# Altium PCB TYPEC_4KRECEIVER-v1.0.PcbDoc (part 1 of 12)
Units mil, origin at the board's own origin, x right, y up, seen from the top; angles counter-clockwise.
Board outline 2834.7 x 1259.84 mil, 10 copper layers (Top Layer, GND-1, Signal L1, GND-2, PWR-1, PWR-2, GND-3, Signal L2, GND-4, Bottom Layer), stack 61.686 mil thick; 492 components, 339 nets, 2214 pads, 1169 vias.
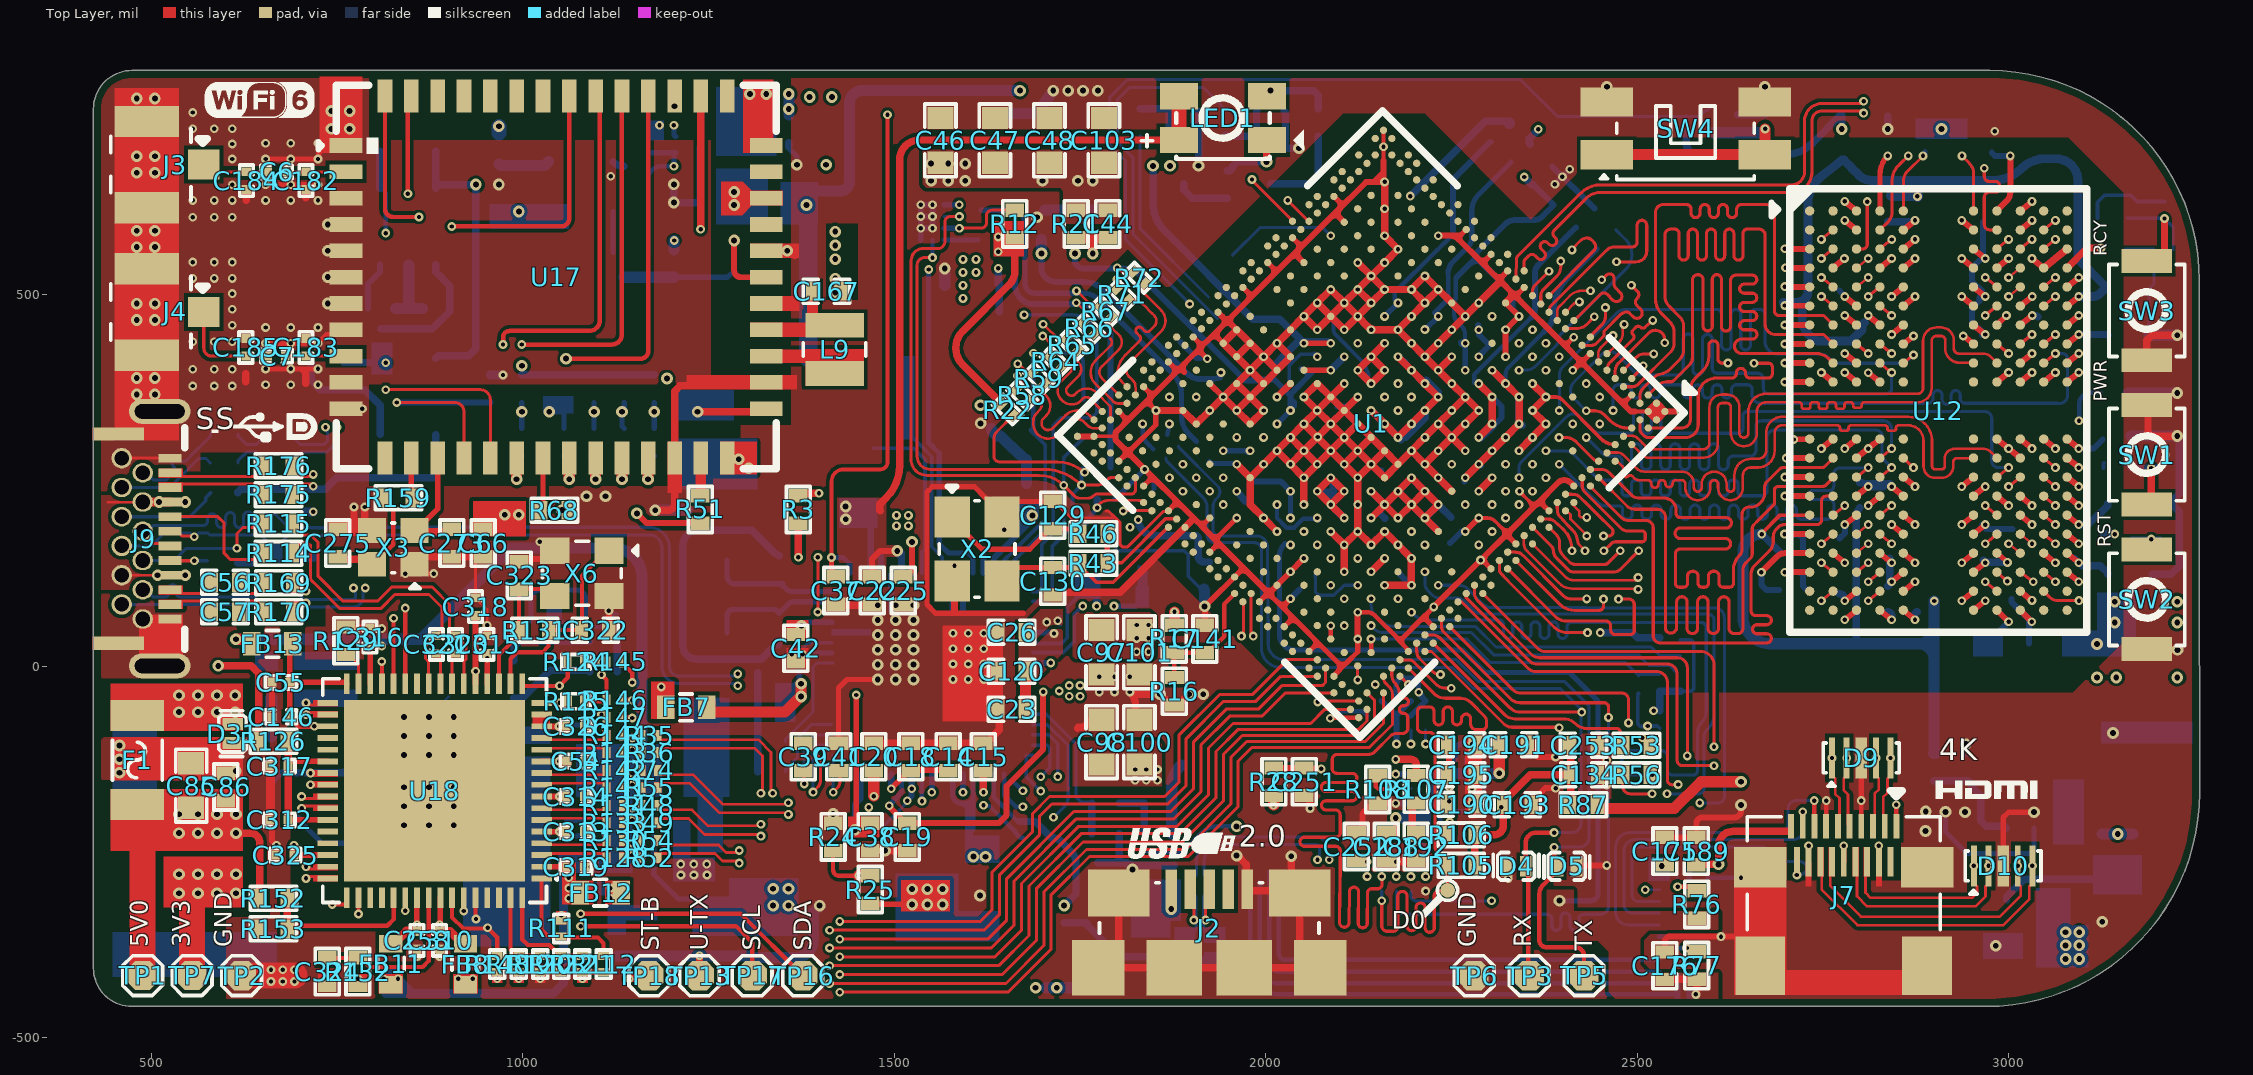
[diagram p0: Top Layer view]
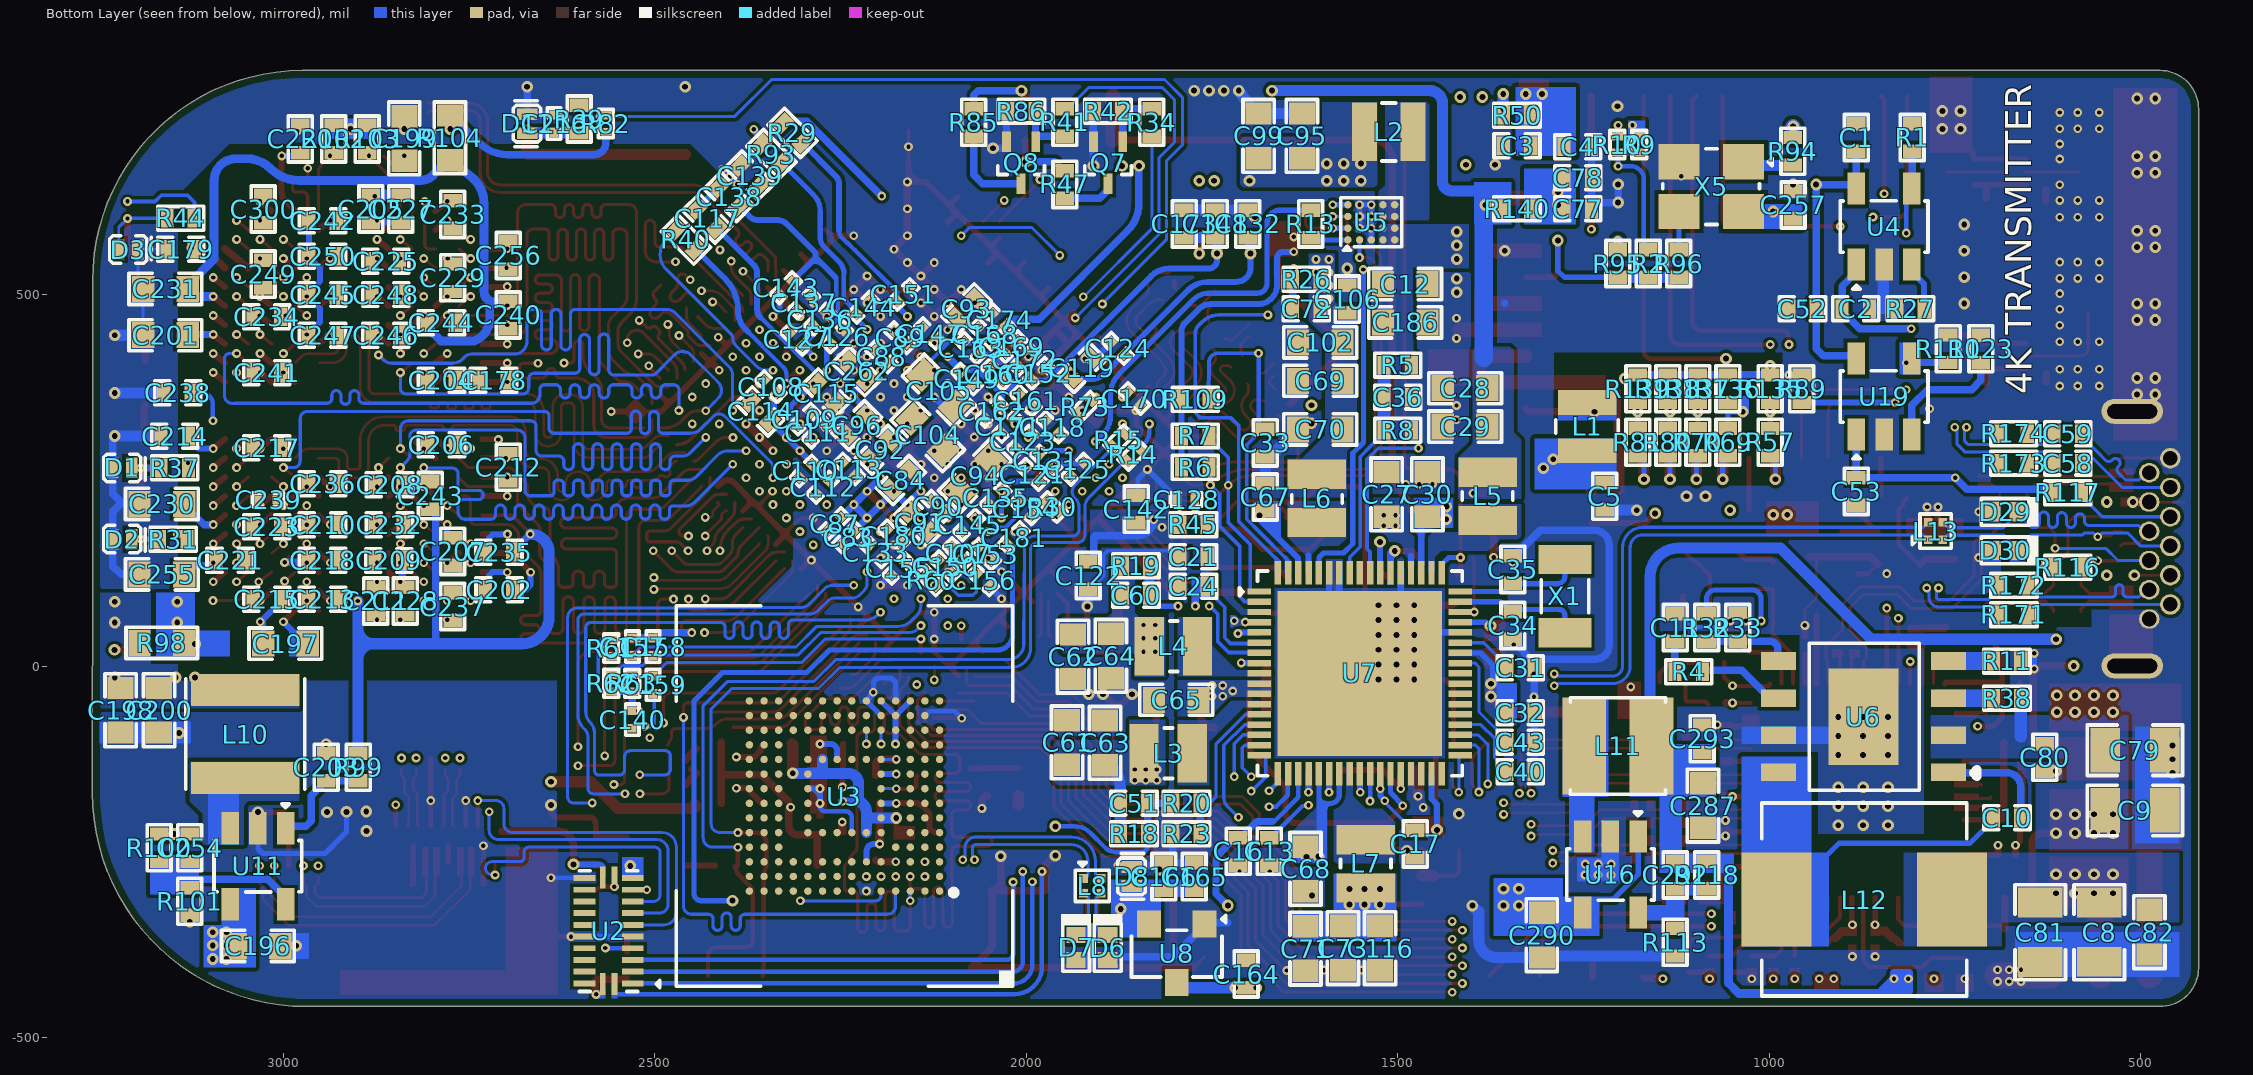
[diagram p1: Bottom Layer view, seen from below]
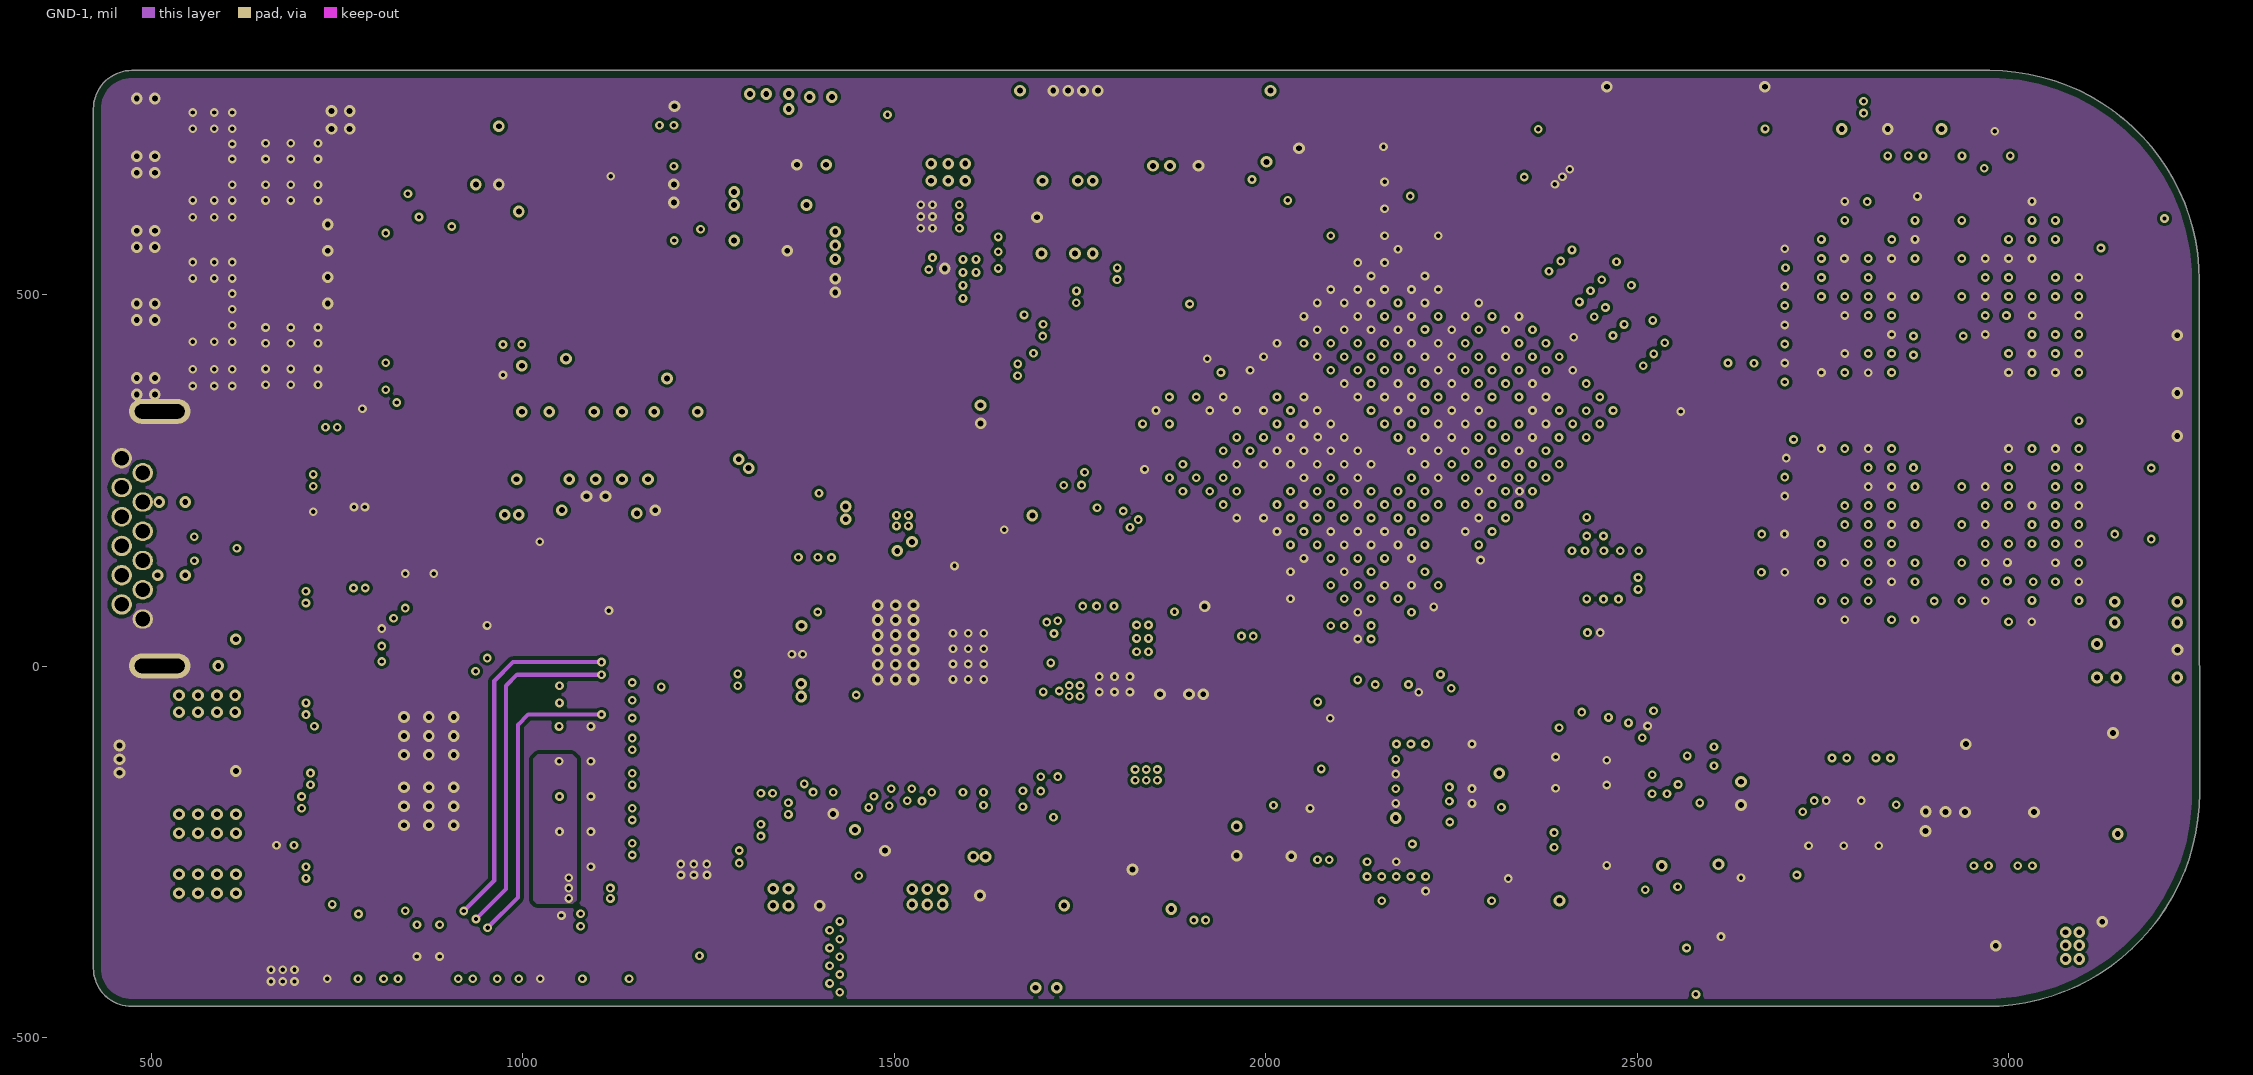
[diagram p2: GND-1]
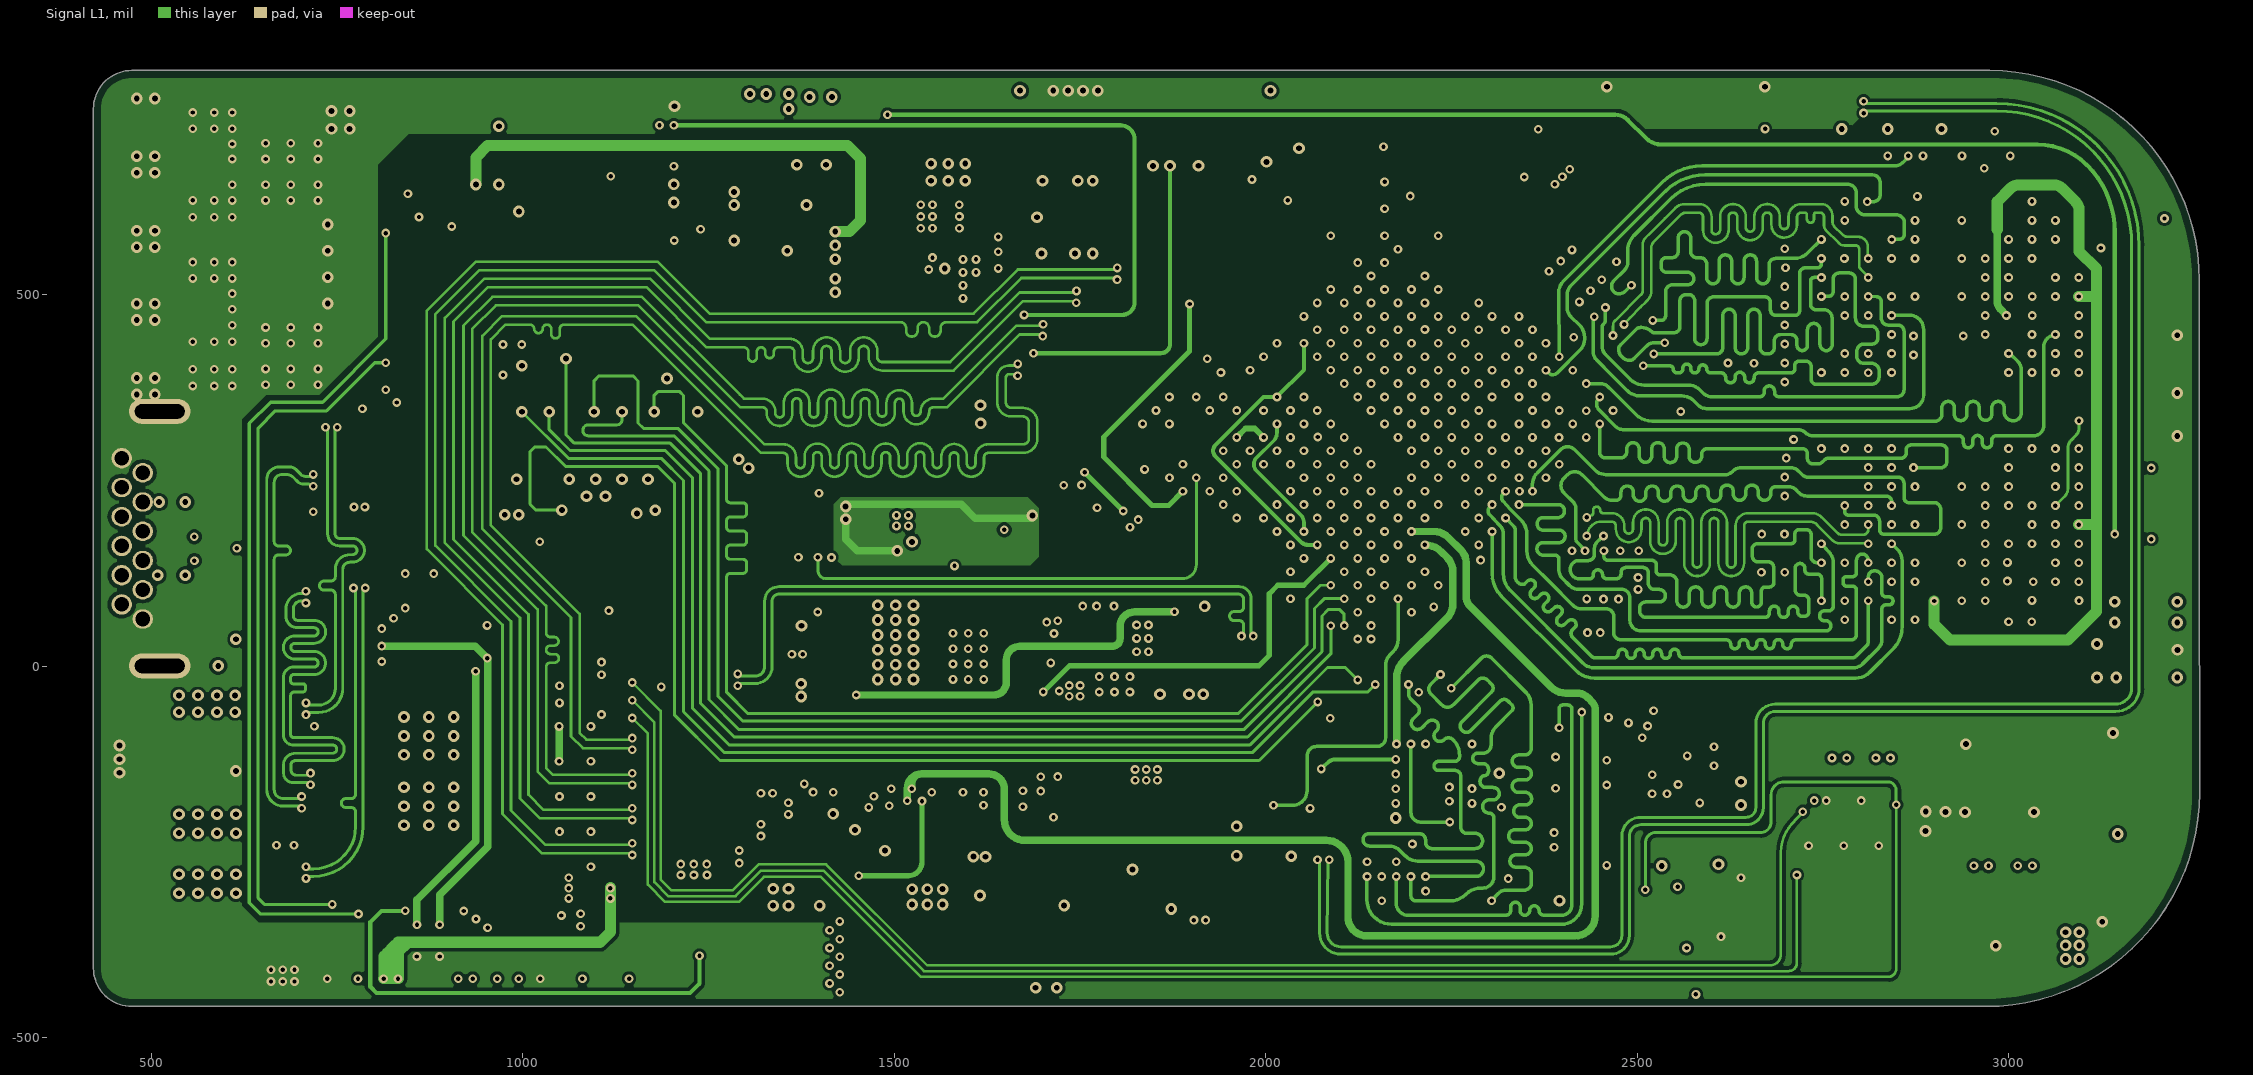
[diagram p3: Signal L1]
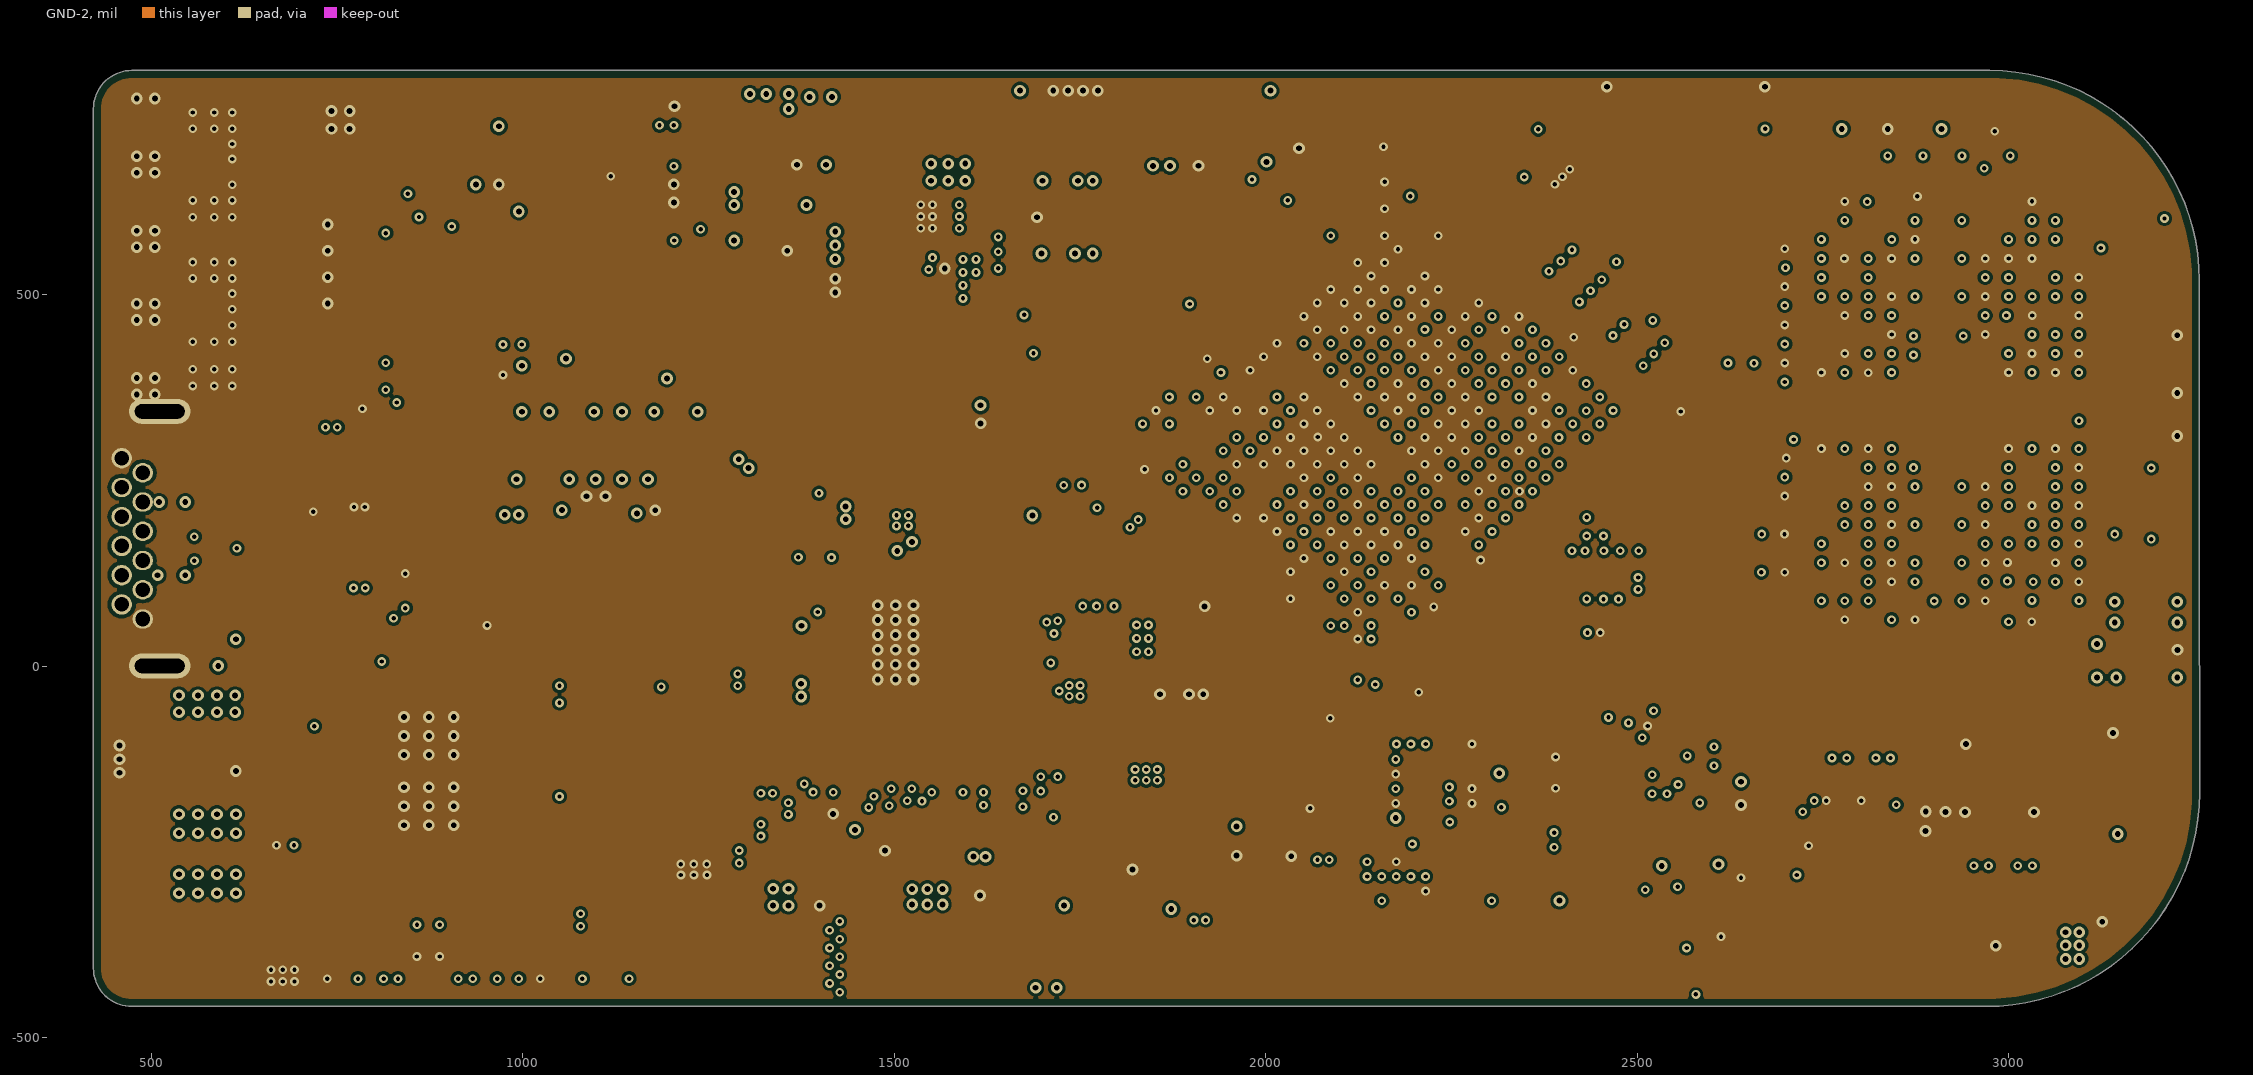
[diagram p4: GND-2]
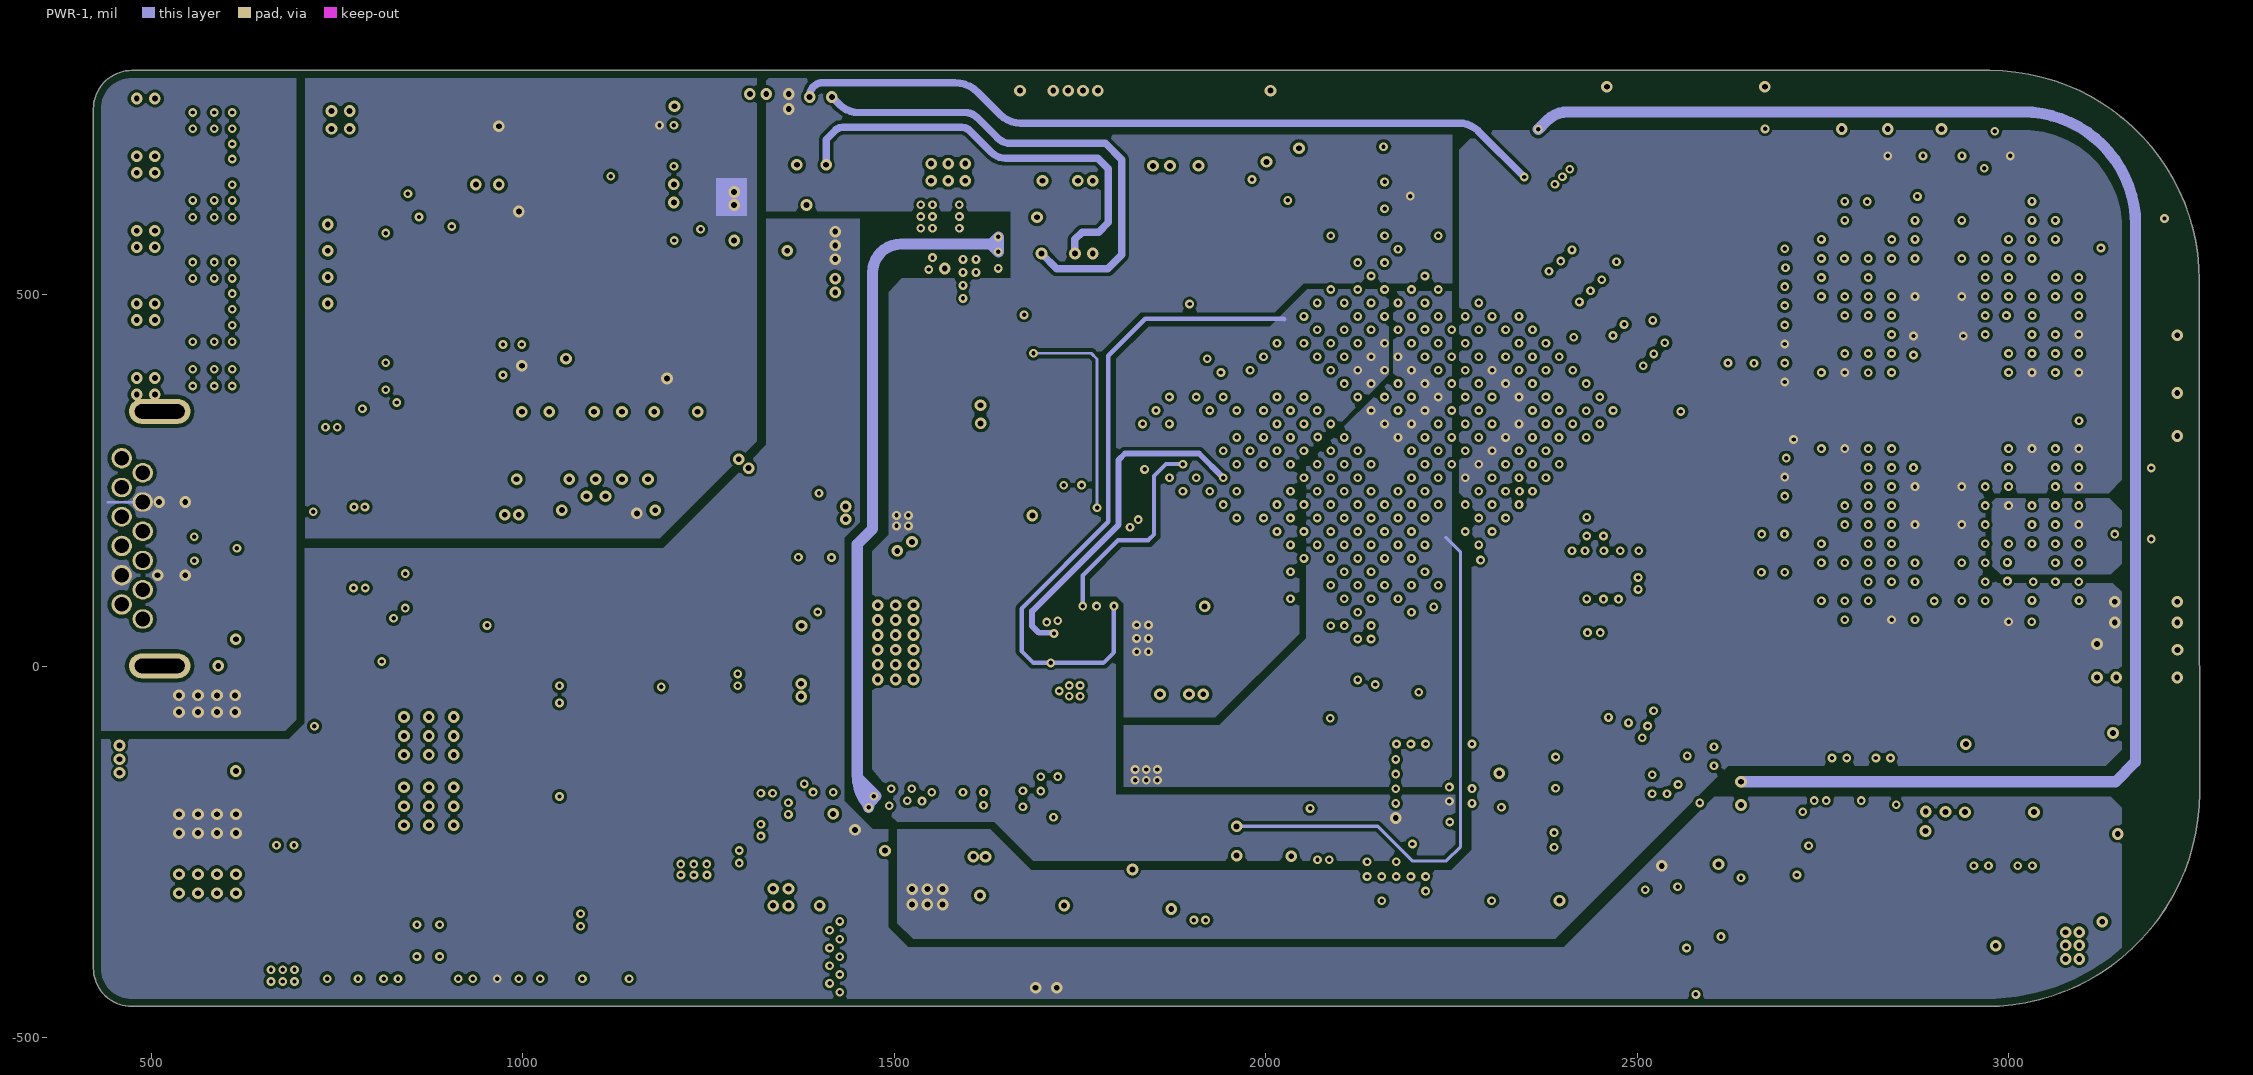
[diagram p5: PWR-1]
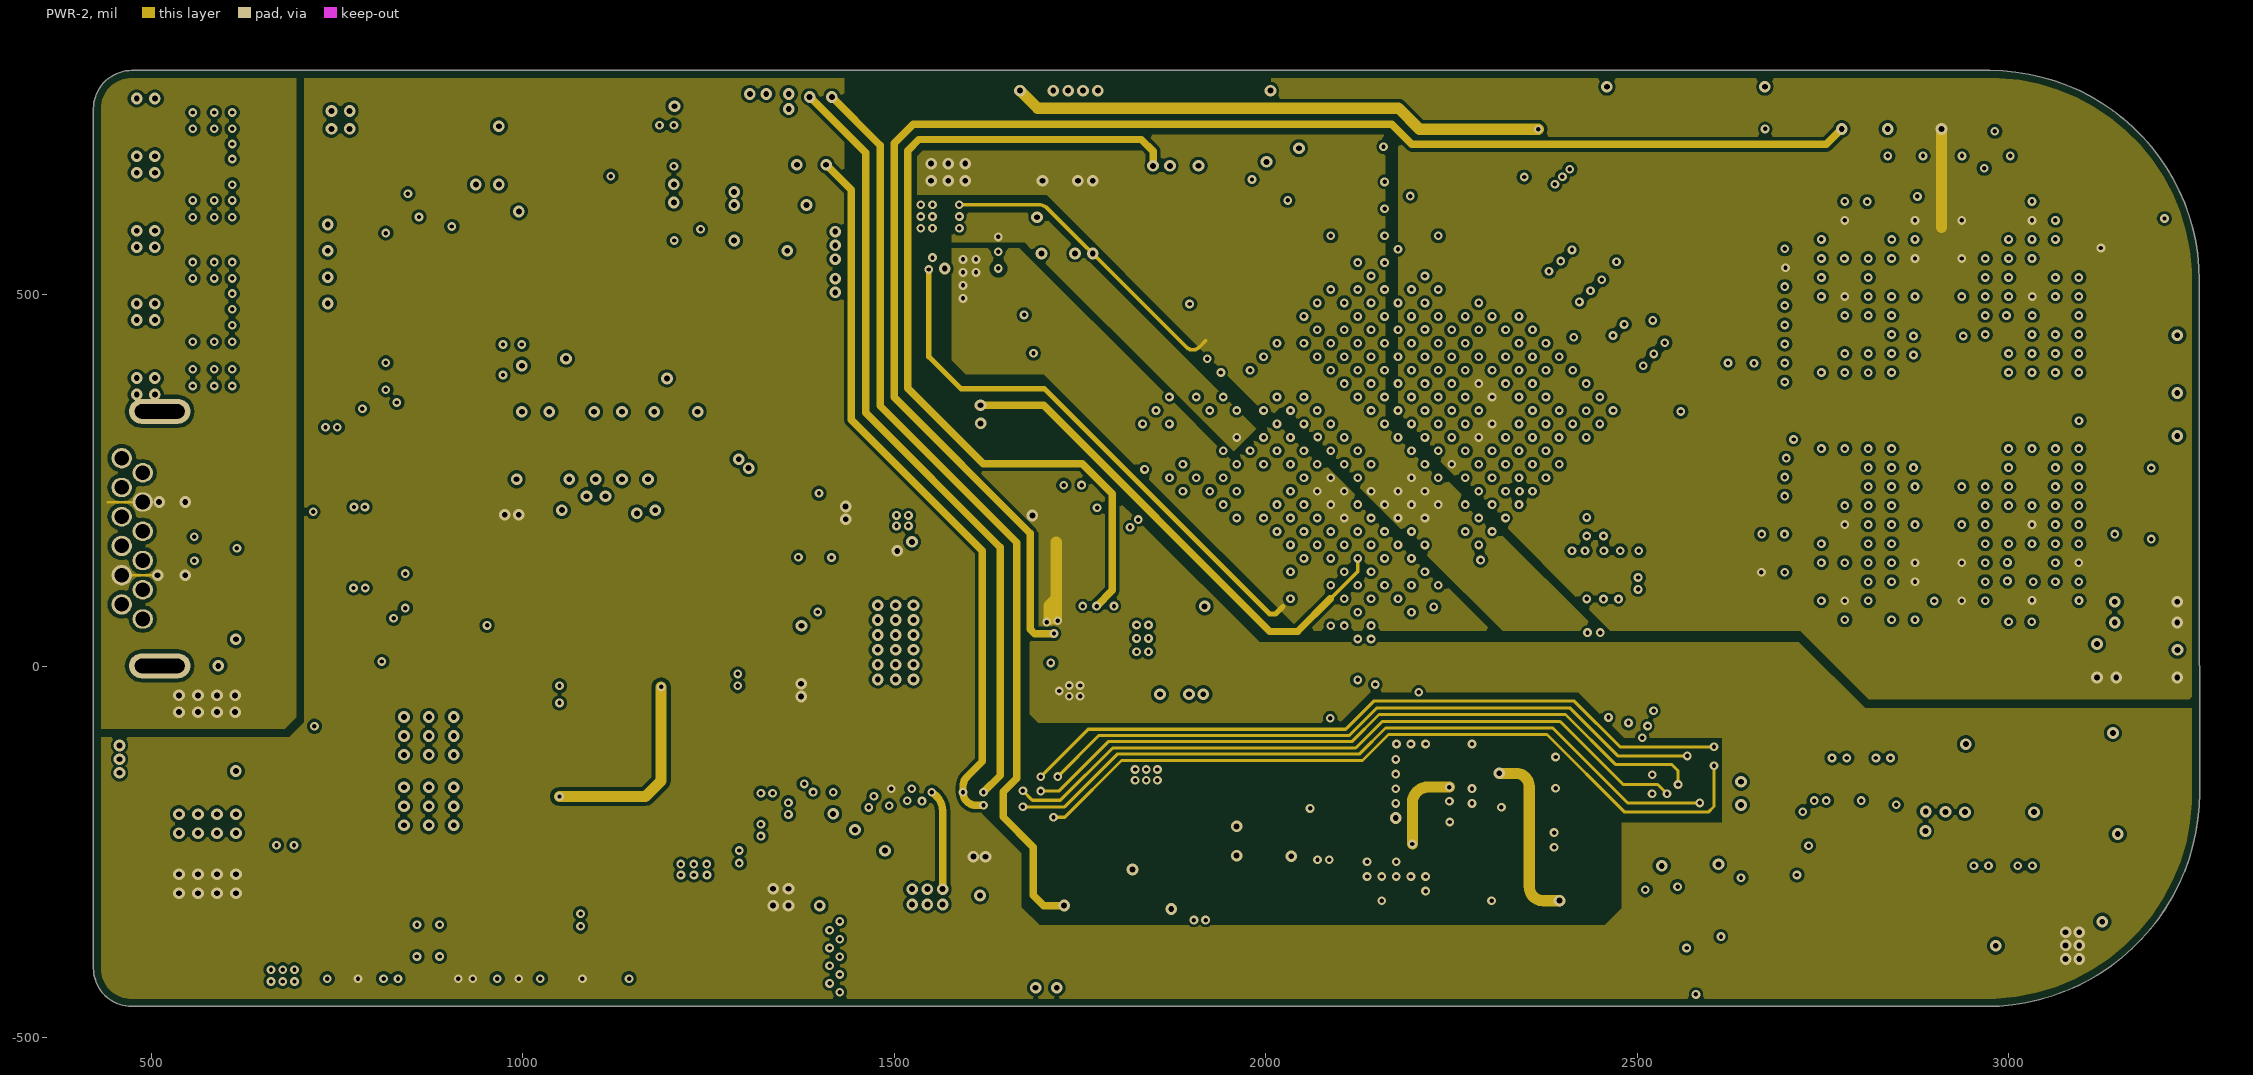
[diagram p6: PWR-2]
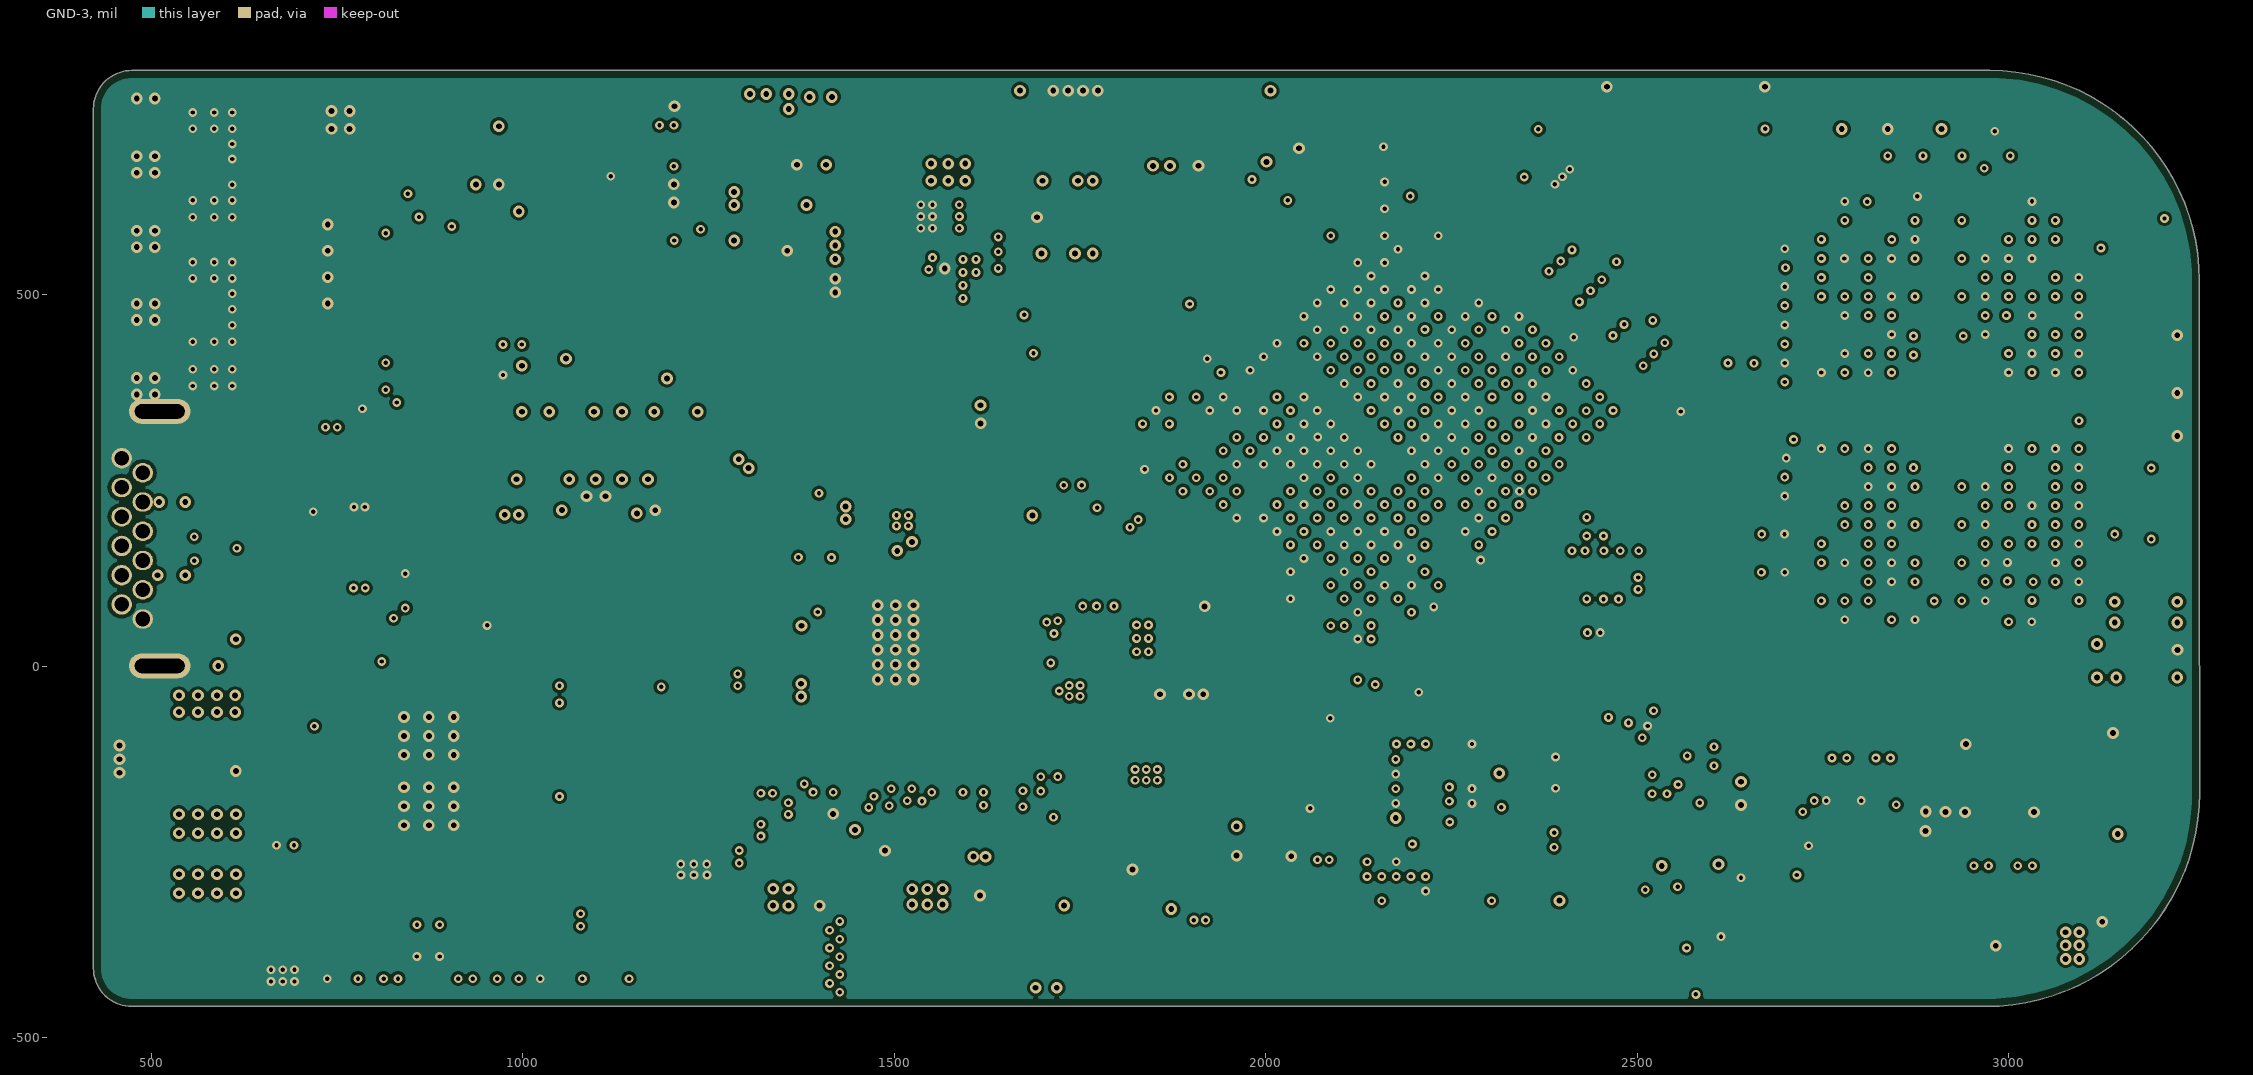
[diagram p7: GND-3]
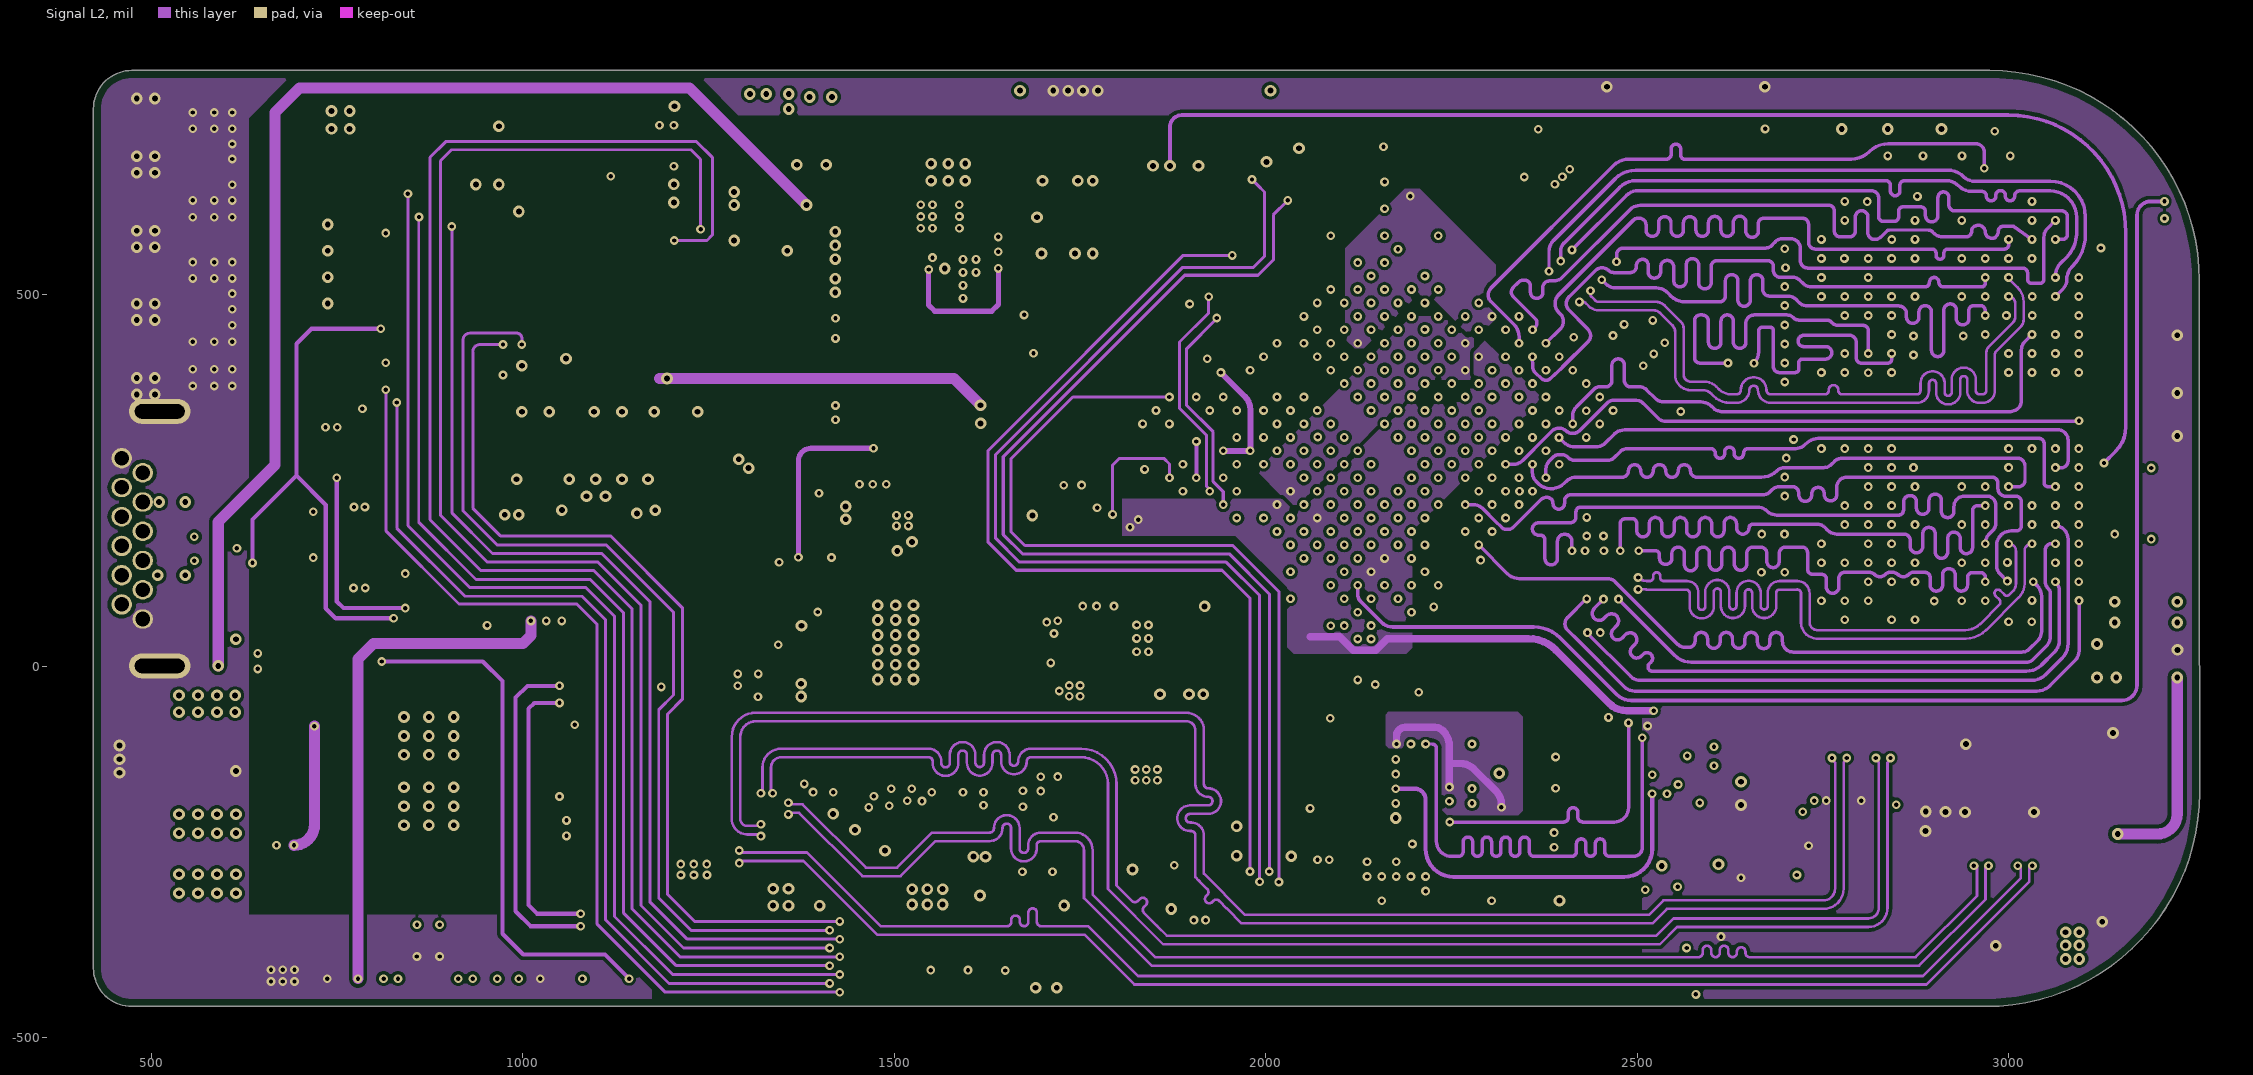
[diagram p8: Signal L2]
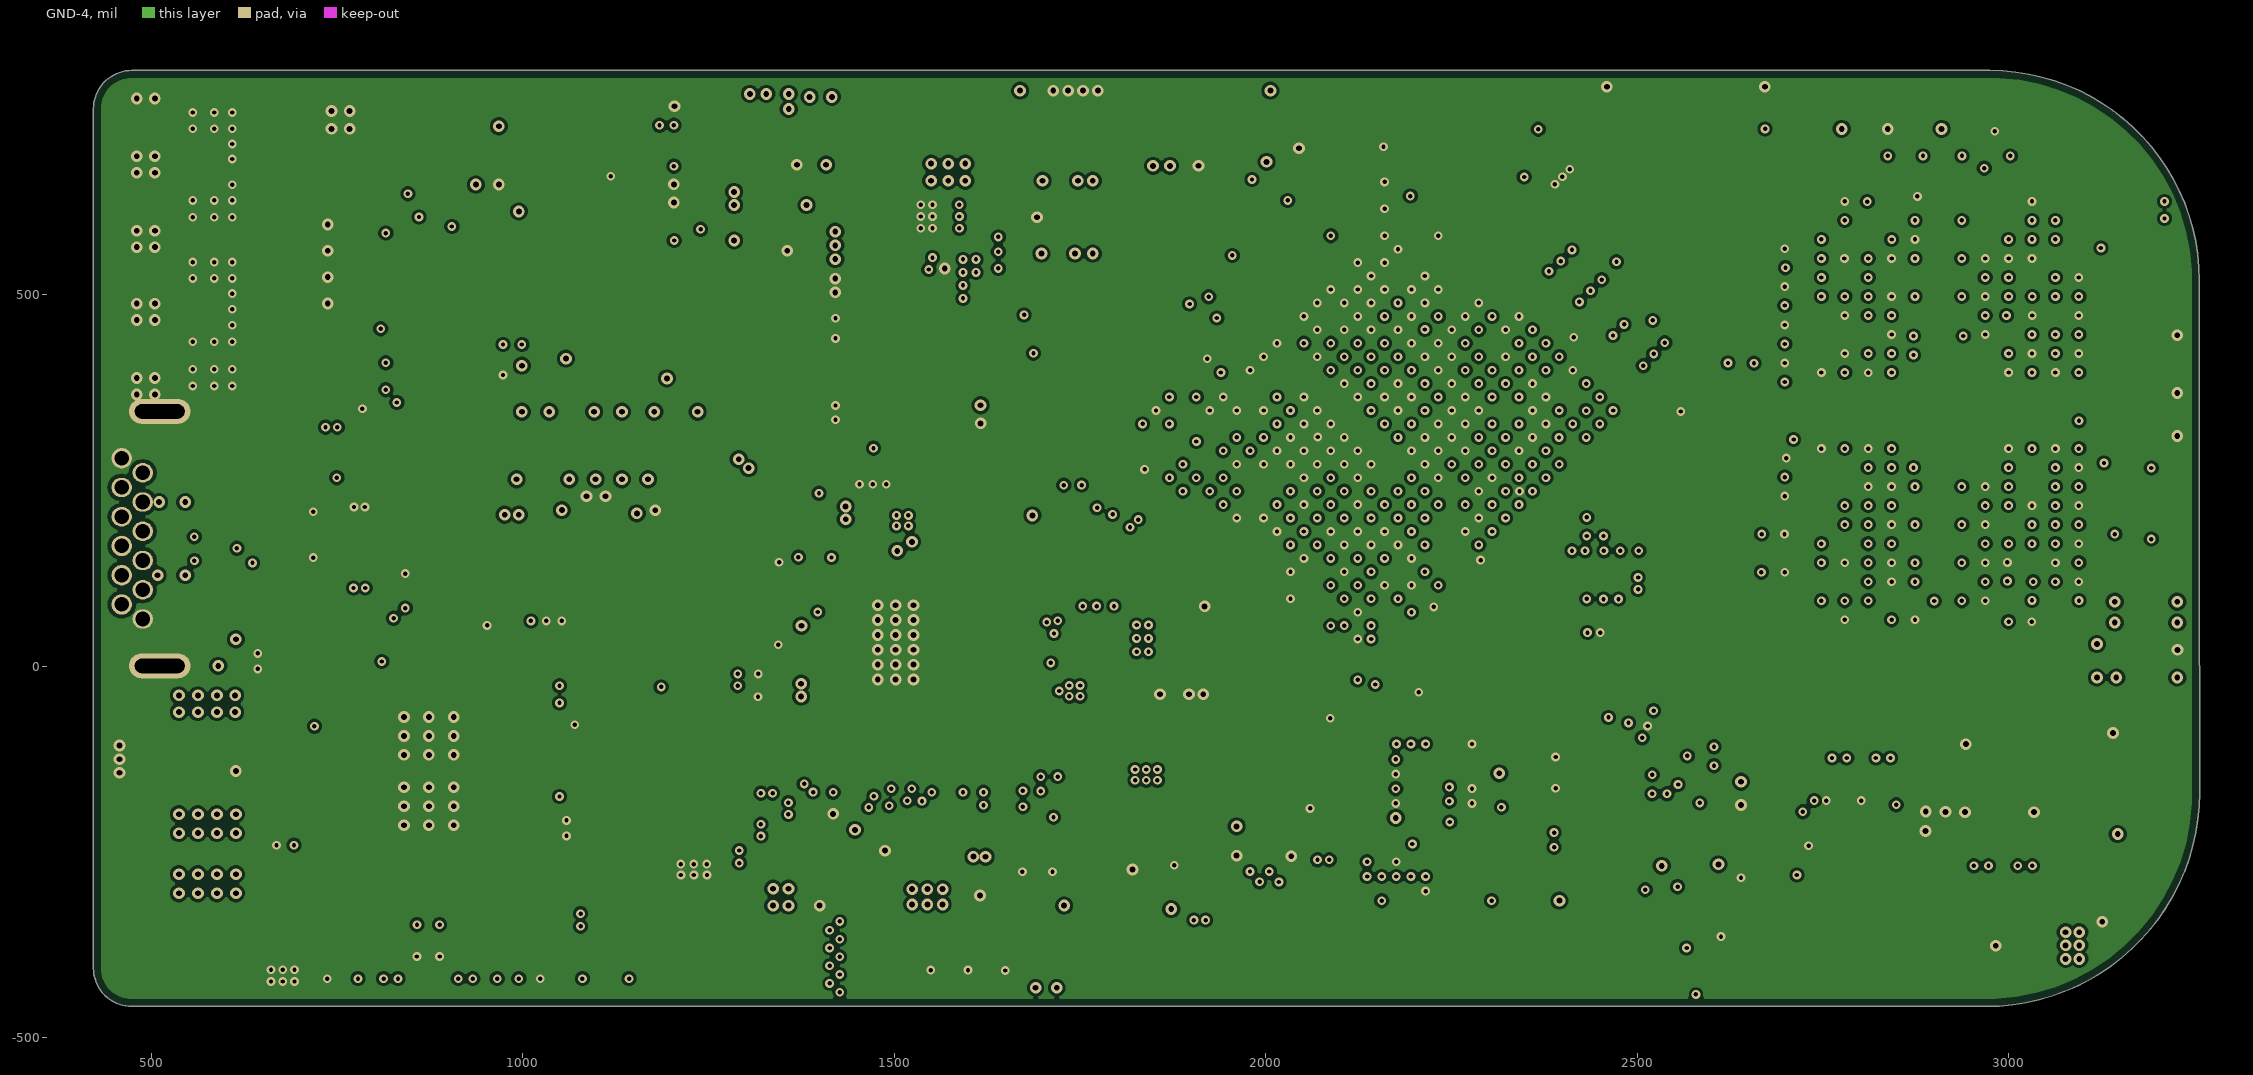
[diagram p9: GND-4]
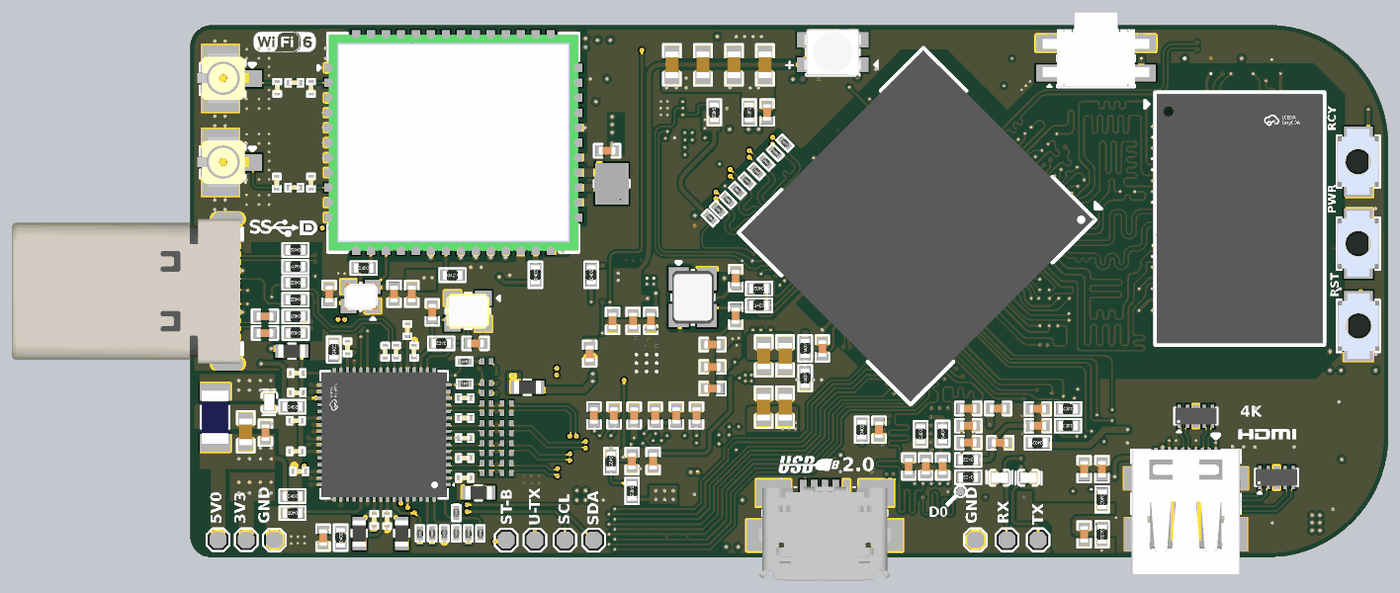
[diagram p18: 3D render of the assembled board from above, using the file's embedded part models]
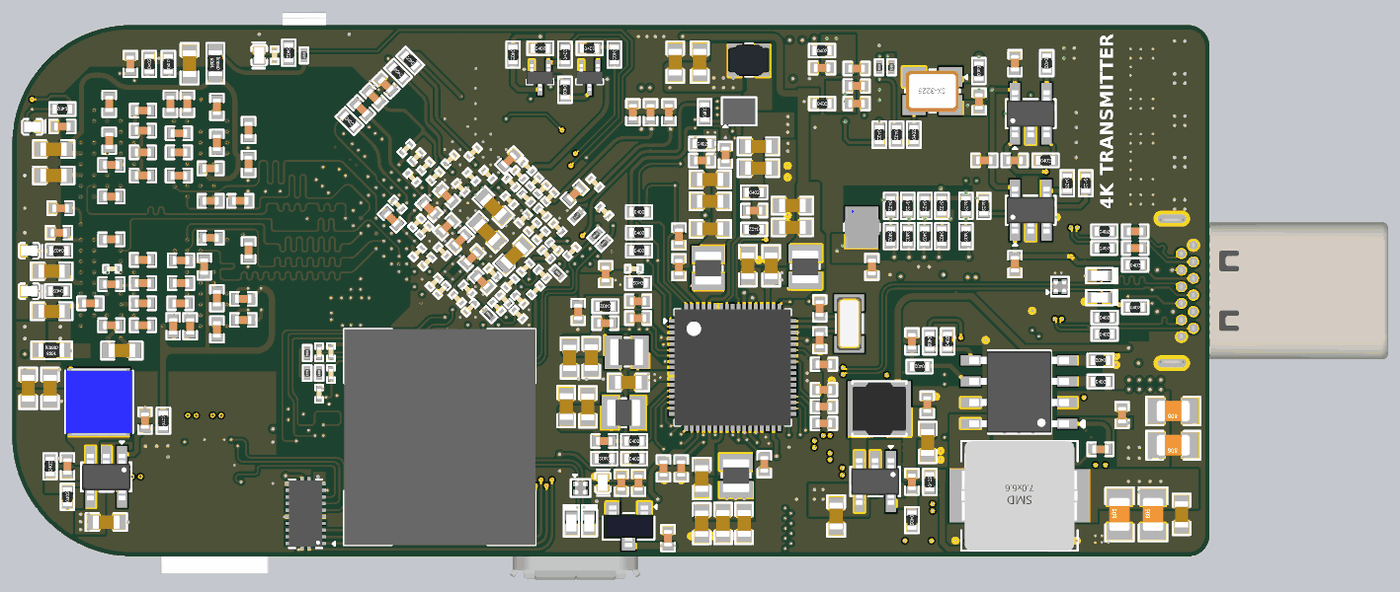
[diagram p19: 3D render of the assembled board from below, using the file's embedded part models]

## Layer stack, top to bottom
Top Solder: solder mask 1, SM-001, Dk 4
Top Layer: signal copper 1.378
Dielectric 1: prepreg 3, PP-007, Dk 4.2
GND-1: signal copper 1.378
Dielectric 2: prepreg 3, PP-007, Dk 4.2
Dielectric 3: prepreg 3, PP-007, Dk 4.2
Signal L1: signal copper 1.378
Core 1: core 8, Core-024, Dk 4.6
GND-2: signal copper 1.378
Dielectric 4: prepreg 2.953, PP-1080, Dk 4
PWR-1: signal copper 1.378
Core 2: core 8, Core-024, Dk 4.6
PWR-2: signal copper 1.378
Dielectric 5: prepreg 2.953, PP-1080, Dk 4
GND-3: signal copper 1.378
Core 3: core 8, Core-024, Dk 4.6
Signal L2: signal copper 1.378
Dielectric 6: prepreg 3, PP-007, Dk 4.2
Dielectric 7: prepreg 3, PP-007, Dk 4.2
GND-4: signal copper 1.378
Dielectric 8: prepreg 3, PP-007, Dk 4.2
Bottom Layer: signal copper 1.378
Bottom Solder: solder mask 1, SM-001, Dk 4

## Board outline
422.36,-406.75 ccw(c473.88,-406.75) 473.88,-458.27 2969.38,-458.27 ccw(c2969.34,-170.56) 3257.05,-170.52 3257,171.83 3256.7,519.23 ccw(c2974.4,519.27) 2974.44,801.57 473.88,801.57 ccw(c473.88,750.05) 422.36,750.05

## Design rules (kind name [scope] priority, off if disabled: settings)
BoardOutlineClearance [All] p1: gap=0 ignorepadtopadclearanceinfootprint=FALSE except(10: Track-OutlineEdge Track-CavityEdge Track-CutoutEdge Track-SplitBarrior Track-SplitContinuation Poly-OutlineEdge Poly-CavityEdge Poly-CutoutEdge Poly-SplitBarrior Poly-SplitContinuation)
Clearance [All] p1: gap=4 ignorepadtopadclearanceinfootprint=FALSE except(3.5: Arc-SMDPad Track-SMDPad; 5: Arc-Poly Track-Poly SMDPad-Poly THPad-Poly Fill-Poly Poly-Poly)
ComponentClearance [All] p1: gap=0 collisioncheckmode=3 verticalgap=0 showdistances=FALSE
DiffPairsRouting "TYPE C_DP_90OHM" [InDifferentialPairClass('TYPEC_DP_LINES_90')] p1: maxlimit=10 minlimit=4.7 mostfreqgap=10 toplayer_mingap=6 toplayer_maxgap=6 toplayer_prefgap=6 toplayer_minwidth=4.1 toplayer_maxwidth=4.1 toplayer_prefwidth=4.1 midlayer2_mingap=6 midlayer2_maxgap=6 midlayer2_prefgap=6 midlayer2_minwidth=4 midlayer2_maxwidth=4 midlayer2_prefwidth=4 midlayer7_mingap=6 midlayer7_maxgap=6 midlayer7_prefgap=6 midlayer7_minwidth=4 midlayer7_maxwidth=4 midlayer7_prefwidth=4 bottomlayer_mingap=6 bottomlayer_maxgap=6 bottomlayer_prefgap=6 bottomlayer_minwidth=4.1 bottomlayer_maxwidth=4.1 bottomlayer_prefwidth=4.1 impedanceprofiledriven=TRUE impedanceprofileid={81E53C64-6B03-40FB-A918-818FED8B2426} impedanceprofilevalue=90.000000 maxuncoupledlength=500
DiffPairsRouting HDMI_100OHM [InDifferentialPairClass('HDMI_100R')] p2: maxlimit=10 minlimit=5 mostfreqgap=5 toplayer_mingap=8 toplayer_maxgap=8 toplayer_prefgap=8 toplayer_minwidth=3.5 toplayer_maxwidth=3.5 toplayer_prefwidth=3.5 midlayer2_mingap=8 midlayer2_maxgap=8 midlayer2_prefgap=8 midlayer2_minwidth=3.5 midlayer2_maxwidth=3.5 midlayer2_prefwidth=3.5 midlayer7_mingap=8 midlayer7_maxgap=8 midlayer7_prefgap=8 midlayer7_minwidth=3.5 midlayer7_maxwidth=3.5 midlayer7_prefwidth=3.5 bottomlayer_mingap=8 bottomlayer_maxgap=8 bottomlayer_prefgap=8 bottomlayer_minwidth=3.5 bottomlayer_maxwidth=3.5 bottomlayer_prefwidth=3.5 impedanceprofiledriven=TRUE impedanceprofileid={0E387EEF-3E8D-41D4-A9F2-D488768D6465} impedanceprofilevalue=100.000000 maxuncoupledlength=500
DiffPairsRouting MIPI_100OHM [InDifferentialPairClass('MIPI_LINES_100')] p3: maxlimit=10 minlimit=5 mostfreqgap=10 toplayer_mingap=8 toplayer_maxgap=8 toplayer_prefgap=8 toplayer_minwidth=3.5 toplayer_maxwidth=3.5 toplayer_prefwidth=3.5 midlayer2_mingap=8 midlayer2_maxgap=8 midlayer2_prefgap=8 midlayer2_minwidth=3.5 midlayer2_maxwidth=3.5 midlayer2_prefwidth=3.5 midlayer7_mingap=8 midlayer7_maxgap=8 midlayer7_prefgap=8 midlayer7_minwidth=3.5 midlayer7_maxwidth=3.5 midlayer7_prefwidth=3.5 bottomlayer_mingap=8 bottomlayer_maxgap=8 bottomlayer_prefgap=8 bottomlayer_minwidth=3.5 bottomlayer_maxwidth=3.5 bottomlayer_prefwidth=3.5 impedanceprofiledriven=TRUE impedanceprofileid={0E387EEF-3E8D-41D4-A9F2-D488768D6465} impedanceprofilevalue=100.000000 maxuncoupledlength=500
DiffPairsRouting "LPDDR4x DQS 100OHM" [InDifferentialPairClass('100OHM_DDR_DQS')] p4: maxlimit=9 minlimit=5 mostfreqgap=8 toplayer_mingap=8 toplayer_maxgap=8 toplayer_minwidth=3.5 toplayer_maxwidth=3.5 toplayer_prefwidth=3.5 midlayer2_mingap=8 midlayer2_maxgap=8 midlayer2_minwidth=3.5 midlayer2_maxwidth=3.5 midlayer2_prefwidth=3.5 midlayer7_mingap=8 midlayer7_maxgap=8 midlayer7_minwidth=3.5 midlayer7_maxwidth=3.5 midlayer7_prefwidth=3.5 bottomlayer_mingap=8 bottomlayer_maxgap=8 bottomlayer_minwidth=3.5 bottomlayer_maxwidth=3.5 bottomlayer_prefwidth=3.5 impedanceprofiledriven=TRUE impedanceprofileid={0E387EEF-3E8D-41D4-A9F2-D488768D6465} impedanceprofilevalue=100.000000 maxuncoupledlength=500
DiffPairsRouting "LPDDR4x CLK 100OHM" [InDifferentialPairClass('100OHM_DDR_CLK')] p5: maxlimit=9 minlimit=5 mostfreqgap=8 toplayer_mingap=8 toplayer_maxgap=8 toplayer_minwidth=3.5 toplayer_maxwidth=3.5 toplayer_prefwidth=3.5 midlayer2_mingap=8 midlayer2_maxgap=8 midlayer2_minwidth=3.5 midlayer2_maxwidth=3.5 midlayer2_prefwidth=3.5 midlayer7_mingap=8 midlayer7_maxgap=8 midlayer7_minwidth=3.5 midlayer7_maxwidth=3.5 midlayer7_prefwidth=3.5 bottomlayer_mingap=8 bottomlayer_maxgap=8 bottomlayer_minwidth=3.5 bottomlayer_maxwidth=3.5 bottomlayer_prefwidth=3.5 impedanceprofiledriven=TRUE impedanceprofileid={0E387EEF-3E8D-41D4-A9F2-D488768D6465} impedanceprofilevalue=100.000000 maxuncoupledlength=500
DiffPairsRouting USB_90OHM [InDifferentialPairClass('USB')] p6: maxlimit=8 minlimit=4.7 mostfreqgap=5 toplayer_mingap=6 toplayer_maxgap=6 toplayer_prefgap=6 toplayer_minwidth=4.1 toplayer_maxwidth=4.1 toplayer_prefwidth=4.1 midlayer2_mingap=6 midlayer2_maxgap=6 midlayer2_prefgap=6 midlayer2_minwidth=4 midlayer2_maxwidth=4 midlayer2_prefwidth=4 midlayer7_mingap=6 midlayer7_maxgap=6 midlayer7_prefgap=6 midlayer7_minwidth=4 midlayer7_maxwidth=4 midlayer7_prefwidth=4 bottomlayer_mingap=6 bottomlayer_maxgap=6 bottomlayer_prefgap=6 bottomlayer_minwidth=4.1 bottomlayer_maxwidth=4.1 bottomlayer_prefwidth=4.1 impedanceprofiledriven=TRUE impedanceprofileid={81E53C64-6B03-40FB-A918-818FED8B2426} impedanceprofilevalue=90.000000 maxuncoupledlength=500
HoleSize [All] p1: absolutevalues=TRUE maxlimit=120 minlimit=1 maxpercent=80.000 minpercent=20.000
HoleToHoleClearance [All] p1: gap=7 allowstackedmicrovias=TRUE
MatchedLengths HDMI [InDifferentialPairClass('HDMI100')] p1: tolerance=10 checknetsindiffpair=FALSE checkdiffpairvsdiffpair=TRUE checkxsignals=TRUE checkothers=TRUE
MatchedLengths "DDR DQS" [InNetClass('50OHM_DDR')] p2: tolerance=1000 checknetsindiffpair=TRUE checkdiffpairvsdiffpair=FALSE checkxsignals=FALSE checkothers=FALSE usedelayunits=TRUE delaytolerance=1.000000
MatchedLengths "DDR DataLines(DQ)" [InNetClass('A_DQ[15..0]') or InNetClass('B_DQ[15..0]')] p3: tolerance=1000 checknetsindiffpair=FALSE checkdiffpairvsdiffpair=TRUE checkxsignals=TRUE checkothers=TRUE usedelayunits=TRUE delaytolerance=5.000000
MatchedLengths "DDR CLK Matching" [InDifferentialPair('A_CLK') or InDifferentialPair('B_CLK')] p4: tolerance=1000 checknetsindiffpair=FALSE checkdiffpairvsdiffpair=TRUE checkxsignals=TRUE checkothers=TRUE usedelayunits=TRUE delaytolerance=5.000000
MatchedLengths "EMMC Delay Matching" [InNetClass('eMMC_DATA[7..0]')    OR InNet('eMMC_CLK')] p5: tolerance=20 checknetsindiffpair=FALSE checkdiffpairvsdiffpair=TRUE checkxsignals=TRUE checkothers=TRUE usedelayunits=TRUE delaytolerance=10.000000
MinimumSolderMaskSliver [All] p1: minsoldermaskwidth=0
PolygonConnect [All] p1: connectstyle=Direct reliefconductorwidth=15 reliefentries=4 polygonreliefangle="45 Angle" airgapwidth=10
RoutingVias RoutingVias_BGA [WithinRoom('Rockchip') OR WithinRoom('LPDDR4x')] p1: holewidth=5.91 width=11.81 viastyle="Through Hole" minholewidth=5.91 minwidth=11.81 maxholewidth=5.91 maxwidth=11.81
RoutingVias [All] p2: holewidth=7.87 width=15.75 viastyle="Through Hole" minholewidth=5.91 minwidth=11.81 maxholewidth=11.81 maxwidth=23.62
SilkToSilkClearance [All] p1: silktosilkclearance=0
SilkToSolderMaskClearance [IsPad] p1: minsilkscreentomaskgap=0 clearancetoexposedcopper=TRUE
SolderMaskExpansion [All] p1: expansion=4 istentingtop=FALSE
SupplyNets "Schematic Supply Nets_36" [InNet('VCC33_R')] p1: voltage=0.000
SupplyNets "Schematic Supply Nets_34" [InNet('VCC33_IO')] p2: voltage=0.000
SupplyNets "Schematic Supply Nets_31" [InNet('VCC12_R')] p3: voltage=0.000
SupplyNets "Schematic Supply Nets_30" [InNet('VCC12_T')] p4: voltage=0.000
SupplyNets "Schematic Supply Nets_27" [InNet('DCC_2')] p5: voltage=0.000
SupplyNets "Schematic Supply Nets_17" [InNet('VCC18_T')] p6: voltage=0.000
SupplyNets "Schematic Supply Nets_16" [InNet('DCC_1')] p7: voltage=0.000
SupplyNets "Schematic Supply Nets_12" [InNet('VDD12')] p8: voltage=0.000
SupplyNets "Schematic Supply Nets_2" [InNet('VCCIO6')] p9: voltage=0.000
SupplyNets "Schematic Supply Nets_48" [InNet('VCC_1V2')] p10: voltage=0.000
SupplyNets "Schematic Supply Nets_47" [InNet('VCC5V_USB')] p11: voltage=0.000
SupplyNets "Schematic Supply Nets_46" [InNet('VCC_WL')] p12: voltage=0.000
SupplyNets "Schematic Supply Nets_45" [InNet('VCC1V8_PMU')] p13: voltage=0.000
SupplyNets "Schematic Supply Nets_42" [InNet('USB_5V')] p14: voltage=0.000
SupplyNets "Schematic Supply Nets_39" [InNet('VCC1V8')] p15: voltage=0.000
SupplyNets "Schematic Supply Nets_37" [InNet('VDD_CPU')] p16: voltage=0.000
SupplyNets "Schematic Supply Nets_35" [InNet('VCC_1P8D')] p17: voltage=0.000
SupplyNets "Schematic Supply Nets_33" [InNet('VDD_GPU')] p18: voltage=0.000
SupplyNets "Schematic Supply Nets_32" [InNet('VCC1V8_DDR')] p19: voltage=0.000
SupplyNets "Schematic Supply Nets_29" [InNet('VCC0V6_DDR')] p20: voltage=0.000
SupplyNets "Schematic Supply Nets_28" [InNet('VCCA_1V8')] p21: voltage=0.000
SupplyNets "Schematic Supply Nets_26" [InNet('VDD_NPU')] p22: voltage=0.000
SupplyNets "Schematic Supply Nets_25" [InNet('VCCA1V8_IMAGE')] p23: voltage=0.000
SupplyNets "Schematic Supply Nets_24" [InNet('VCC_CPVSS')] p24: voltage=0.000
SupplyNets "Schematic Supply Nets_23" [InNet('VCC_1P8A')] p25: voltage=0.000
SupplyNets "Schematic Supply Nets_22" [InNet('GND')] p26: voltage=0.000
SupplyNets "Schematic Supply Nets_21" [InNet('VCC3V3_SYS')] p27: voltage=0.000
SupplyNets "Schematic Supply Nets_20" [InNet('VCC5V0_SYS')] p28: voltage=0.000
SupplyNets "Schematic Supply Nets_19" [InNet('VCCIO_ACODEC')] p29: voltage=0.000
SupplyNets "Schematic Supply Nets_18" [InNet('VCC_CPVDD')] p30: voltage=0.000
SupplyNets "Schematic Supply Nets_15" [InNet('VCC5V_HDMI')] p31: voltage=0.000
SupplyNets "Schematic Supply Nets_14" [InNet('VCC3V3_PMU')] p32: voltage=0.000
SupplyNets "Schematic Supply Nets_13" [InNet('VCCIO_SD')] p33: voltage=0.000
SupplyNets "Schematic Supply Nets_11" [InNet('VDDA0V9_PMU')] p34: voltage=0.000
SupplyNets "Schematic Supply Nets_10" [InNet('VCC_3V3')] p35: voltage=0.000
SupplyNets "Schematic Supply Nets_9" [InNet('VCCA1V8_PMU')] p36: voltage=0.000
SupplyNets "Schematic Supply Nets_8" [InNet('VCC_1V8')] p37: voltage=0.000
SupplyNets "Schematic Supply Nets_7" [InNet('VCC_DDR')] p38: voltage=0.000
SupplyNets "Schematic Supply Nets_6" [InNet('VCC3V3_SD')] p39: voltage=0.000
SupplyNets "Schematic Supply Nets_5" [InNet('VDD_LOGIC')] p40: voltage=0.000
SupplyNets "Schematic Supply Nets_4" [InNet('VCCIO_WL')] p41: voltage=0.000
SupplyNets "Schematic Supply Nets_3" [InNet('VDDA0V9_IMAGE')] p42: voltage=0.000
SupplyNets "Schematic Supply Nets_1" [InNet('VDDA_0V9')] p43: voltage=0.000
SupplyNets "Schematic Supply Nets" [InNet('VCCIO_FLASH')] p44: voltage=0.000
Width Width_50OHM [InNetClass('50OHM_DDR') OR InNetClass('50OHM_eMMC') OR InNetClass('RF')] p1: maxlimit=10 minlimit=4.2 preferedwidth=10 toplayer_maxwidth=4.2 toplayer_prefwidth=4.2 midlayer2_minwidth=4.7 midlayer2_maxwidth=4.7 midlayer2_prefwidth=4.7 midlayer7_minwidth=4.7 midlayer7_maxwidth=4.7 midlayer7_prefwidth=4.7 bottomlayer_maxwidth=4.2 bottomlayer_prefwidth=4.2 impedanceprofiledriven=TRUE impedanceprofileid={37D9DA4F-B0C0-4549-8FB2-6FA882E1BE7E} impedanceprofilevalue=50.000000 minimp=50.000000 maximp=50.000000 favimp=50.000000
Width [All] p2: maxlimit=50 minlimit=3.5 preferedwidth=7
Width Width_BGA [InComponent('u3')] p3: maxlimit=10 minlimit=3.5 preferedwidth=5
23 further rules are at their usual default settings.

## Classes and differential pairs
component class HDMI_TO_TYPE-C_SHEET: C1 C2 C52 C53 C54 C55 C146 C258 C310 C312 C313 C314 C315 C316 C317 C318 C319 C320 C321 C322 C323 C324 C325 C326 FB7 FB8 FB11 FB12 FB13 R1 R27 R110 R111 R112 R119 R120 R121 R122 R123 R124 R125 R126 R128 R129 R130 R131 R132 R133 R134 R141 R142 R143 R144 R145 R146 R147 R148 R152 R153 TP13 TP16 TP17 TP18 U4 U18 U19 X6
net class 50OHM_eMMC: eMMC_CLK eMMC_CMD eMMC_DATA0 eMMC_DATA1 eMMC_DATA2 eMMC_DATA3 eMMC_DATA4 eMMC_DATA5 eMMC_DATA6 eMMC_DATA7 eMMC_DATA_STROBE
differential pair class HDMI_100R: #CLK #HDMI_TX0 #HDMI_TX1 #HDMI_TX2 #HDMI_TXCLK #TX0 #TX1 #TX2 HDMI_TX0 HDMI_TX1 HDMI_TX2 HDMI_TXCLK TMDS_CLK TMDS_D0 TMDS_D1 TMDS_D2
differential pair class 100OHM_DDR_DQS: LPDDR4_DQS0_A LPDDR4_DQS0_B LPDDR4_DQS1_A LPDDR4_DQS1_B
differential pair class 100OHM_DDR_CLK: LPDDR4_CLK_A LPDDR4_CLK_B
differential pair class USB: USB2.0_D USB2_HOST2_D
differential pair class TYPEC_DP_LINES_90: AUX LANE0_RX1 LANE0_RX2 LANE1_TX1 LANE1_TX2 LANE2_RX2 LANE2_TX1 LANE3_RX1 LANE3_TX2 RX1 RX2 TX1 TX2 USB_D USB_OTG0_D
net class RF: NetANT1_1 NetC6_2 NetC7_2 WL_ANT0 WL_ANT1
component class WIFI-6_SHEET: C3 C4 C5 C6 C7 C77 C78 C167 C182 C183 C184 C185 C257 C273 C275 J3 J4 L1 L9 R2 R50 R51 R57 R69 R70 R80 R81 R89 R94 R95 R96 R135 R136 R137 R138 R139 R140 R159 U17 X3 X5
component class USB2.0_SHEET: C164 C165 C166 D6 D7 D8 J2 L8 U8
component class TYPE-C_INTERFACE_SHEET: C56 C57 C58 C59 C85 C86 D29 D30 D31 F1 J9 L13 R114 R115 R116 R117 R169 R170 R171 R172 R173 R174 R175 R176
component class RK3566_VO_SHEET_2: C151 R29
component class RK3566_VO_SHEET_1: C152 C153 C160 C161 C162 C163 C170 C171 C172 C173 C174 R58 R59 R64 R65 R66 R67 R71 R72 R73
component class RK3566_VI_SHEET: C144 C148 C149 C168 C169 R93
component class RK3566_USB_PCIe_SHEET: C135 C136 C137 C138 C139 C140 C141 C142 C143 C145 C147 R16 R17
component class RK3566_SARADC_GPIO: C150 C154 C155 C156 C157 C158 C159 D3 R44 R60 R61 R62 R63 R68 SW3
component class RK3566_POWER_SHEET: C83 C84 C87 C88 C89 C90 C91 C92 C93 C94 C95 C96 C97 C98 C99 C100 C101 C102 C103 C104 C105 C106 C262 U1
component class RK3566_OSC_PMUIO_SHEET: C118 C119 C120 C121 C122 C123 C124 C125 C126 C127 C128 C129 C130 C131 C132 C216 D4 D5 D11 LED1 Q7 Q8 R14 R15 R22 R30 R34 R39 R41 R42 R43 R45 R46 R47 R82 R85 R86 SW4 TP3 TP5 TP6 X2
component class RK3566_FLASH-SD_SHEET: C107 C133 C134 R53 R87
component class RK3566_DDR-PHY_SHEET: C108 C109 C110 C111 C112 C113 C114 C115 C116 C117 R40
component class RK3566_AUDIO_SHEET: C180 C181
component class POWER_PMIC_RK809_MGM: C31 C32 C33 C34 C35 C36 C37 D1 D2 R5 R6 R7 R8 R9 R10 R31 R37 R109 SW1 SW2 X1
component class POWER_PMIC_RK809_LDO: C13 C14 C15 C16 C17 C18 C19 C20 C21 C22 C23 C24 C25 C26 C27 C28 C29 C30 L5 R3
component class "POWER_PMIC_RK809_DC DC": C51 C60 C61 C62 C63 C64 C65 C66 C67 C68 C69 C70 C71 C72 C73 L3 L4 L6 L7 R18 R19 R20 R23 R24 R25 R26 U7
component class POWER_PMIC_RK809_CODEC: C38 C39 C40 C41 C42 C43
component class POWER_OTHER_SHEET: C12 C44 C46 C47 C48 C186 C287 C290 C292 C293 L2 L11 R12 R13 R21 R113 R118 U5 U16
component class POWER_LDO_SHEET: C8 C9 C10 C11 C79 C80 C81 C82 L12 R4 R11 R32 R33 R38 TP1 TP2 TP7 U6
component class HDMI2.0_SHEET: C175 C176 C189 D9 D10 J7 R35 R36 R48 R49 R52 R54 R55 R74 R76 R77 U2
component class eMMC_SPI-FLASH_SHEET: C188 C190 C191 C192 C193 C194 C195 C251 C252 C253 R28 R56 R105 R106 R107 R108 U3
component class DRAM_LPDDR4_SHEET: C178 C179 C196 C197 C198 C199 C200 C201 C202 C203 C204 C205 C206 C207 C208 C209 C210 C211 C212 C213 C214 C215 C217 C218 C220 C221 C223 C225 C227 C228 C229 C230 C231 C232 C233 C234 C235 C236 C237 C238 C239 C240 C241 C242 C243 C244 C245 C246 C247 C248 C249 C250 C254 C255 C256 C300 L10 R98 R99 R100 R101 R102 R103 R104 U11 U12
net class eMMC_DATA[7..0]: eMMC_DATA0 eMMC_DATA1 eMMC_DATA2 eMMC_DATA3 eMMC_DATA4 eMMC_DATA5 eMMC_DATA6 eMMC_DATA7
net class 50OHM_DDR: LPDDR4_A0_A LPDDR4_A0_B LPDDR4_A1_A LPDDR4_A1_B LPDDR4_A2_A LPDDR4_A2_B LPDDR4_A3_A LPDDR4_A3_B LPDDR4_A4_A LPDDR4_A4_B LPDDR4_A5_A LPDDR4_A5_B LPDDR4_CKE0_A LPDDR4_CKE0_B LPDDR4_CKE1_A LPDDR4_CKE1_B LPDDR4_CS0n_A LPDDR4_CS0n_B LPDDR4_CS1n_A LPDDR4_CS1n_B LPDDR4_DM0_A LPDDR4_DM0_B LPDDR4_DM1_A LPDDR4_DM1_B LPDDR4_DQ0_A LPDDR4_DQ0_B LPDDR4_DQ1_A LPDDR4_DQ1_B LPDDR4_DQ2_A LPDDR4_DQ2_B LPDDR4_DQ3_A LPDDR4_DQ3_B LPDDR4_DQ4_A LPDDR4_DQ4_B LPDDR4_DQ5_A LPDDR4_DQ5_B LPDDR4_DQ6_A LPDDR4_DQ6_B LPDDR4_DQ7_A LPDDR4_DQ7_B LPDDR4_DQ8_A LPDDR4_DQ8_B LPDDR4_DQ9_A LPDDR4_DQ9_B LPDDR4_DQ10_A LPDDR4_DQ10_B LPDDR4_DQ11_A LPDDR4_DQ11_B LPDDR4_DQ12_A LPDDR4_DQ12_B LPDDR4_DQ13_A LPDDR4_DQ13_B LPDDR4_DQ14_A LPDDR4_DQ14_B LPDDR4_DQ15_A LPDDR4_DQ15_B LPDDR4_ODT0_CA_A LPDDR4_ODT0_CA_B
differential pair #TX2: +#TX2_P -#TX2_N
differential pair #TX1: +#TX1_P -#TX1_N
differential pair #TX0: +#TX0_P -#TX0_N
differential pair #CLK: +#CLK_P -#CLK_N
differential pair TMDS_D2: +TMDS_D2_P -TMDS_D2_N
differential pair TMDS_D1: +TMDS_D1_P -TMDS_D1_N
differential pair TMDS_D0: +TMDS_D0_P -TMDS_D0_N
differential pair TMDS_CLK: +TMDS_CLK_P -TMDS_CLK_N
differential pair LANE3_RX1: +LANE3_RX1_P -LANE3_RX1_N
differential pair LANE2_TX1: +LANE2_TX1_P -LANE2_TX1_N
differential pair LANE1_TX2: +LANE1_TX2_P -LANE1_TX2_N
differential pair LANE0_RX2: +LANE0_RX2_P -LANE0_RX2_N
differential pair #HDMI_TXCLK: +#HDMI_TXCLK_P -#HDMI_TXCLK_N
differential pair #HDMI_TX2: +#HDMI_TX2_P -#HDMI_TX2_N
differential pair #HDMI_TX1: +#HDMI_TX1_P -#HDMI_TX1_N
differential pair #HDMI_TX0: +#HDMI_TX0_P -#HDMI_TX0_N
differential pair TX2: +TX2_P -TX2_N
differential pair TX1: +TX1_P -TX1_N
differential pair RX2: +RX2_P -RX2_N
differential pair RX1: +RX1_P -RX1_N
differential pair LPDDR4_DQS1_B: +LPDDR4_DQS1_B_P -LPDDR4_DQS1_B_N
differential pair LPDDR4_DQS1_A: +LPDDR4_DQS1_A_P -LPDDR4_DQS1_A_N
differential pair LPDDR4_DQS0_B: +LPDDR4_DQS0_B_P -LPDDR4_DQS0_B_N
differential pair LPDDR4_DQS0_A: +LPDDR4_DQS0_A_P -LPDDR4_DQS0_A_N
differential pair LPDDR4_CLK_B: +LPDDR4_CLK_B_P -LPDDR4_CLK_B_N
differential pair LPDDR4_CLK_A: +LPDDR4_CLK_A_P -LPDDR4_CLK_A_N
differential pair USB_OTG0_D: +USB_OTG0_D_P -USB_OTG0_D_N
differential pair USB_D: +USB_D_P -USB_D_N
differential pair USB2_HOST2_D: +USB2_HOST2_D_P -USB2_HOST2_D_N
differential pair USB2.0_D: +USB2.0_D_P -USB2.0_D_N
differential pair AUX: +AUX_P -AUX_N
differential pair HDMI_TXCLK: +HDMI_TXCLK_P -HDMI_TXCLK_N
differential pair HDMI_TX2: +HDMI_TX2_P -HDMI_TX2_N
differential pair HDMI_TX1: +HDMI_TX1_P -HDMI_TX1_N
differential pair HDMI_TX0: +HDMI_TX0_P -HDMI_TX0_N

## Components (designator, comment, footprint, x,y, rotation, side; value= is the part's Value field where it differs from the comment)
C1 "1uF" Cap-0402 883.03,711.31 r270 bottom
C2 "100nF" Cap-0402 883.7,481.02 r0 bottom
C3 "10uF" Cap-0402 1339.62,700.25 r180 bottom
C4 "0.1uF" Cap-0402 1257.87,698.77 r0 bottom
C5 "4.7uF" Cap-0402 1221.72,228.4 r90 bottom
C6 "10pF" CAP-0201 668.79,665.16 r180 top
C7 "10pF" CAP-0201 668.79,417.13 r180 top
C8 "47uF" Cap-0805 555.98,-358.23 r90 bottom
C9 "22uF" Cap-0805 508.03,-194.37 r0 bottom
C10 "100nF" Cap-0402 680.31,-203.99 r0 bottom
C11 "4.7nF" Cap-0402 1126.65,51.81 r90 bottom
C12 "22uF" Cap-0603 1490.18,513.97 r0 bottom
C13 "1uF" Cap-0402 1673.18,-249.47 r90 bottom
C14 "1uF" Cap-0402 1572.68,-122.26 r270 top
C15 "1uF" Cap-0402 1620.26,-122.26 r270 top
C16 "1uF" Cap-0402 1715.18,-249.47 r90 bottom
C17 "4.7uF" Cap-0402 1476.58,-239.51 r90 bottom
C18 "1uF" Cap-0402 1522.68,-122.26 r270 top
C19 "1uF" Cap-0402 1517.68,-230.01 r90 top
C20 "1uF" Cap-0402 1472.68,-122.26 r270 top
C21 "1uF" Cap-0402 1775.18,147.03 r180 bottom
C22 "1uF" Cap-0402 1470.27,101.6 r90 top
C23 "1uF" Cap-0402 1658.18,-58.41 r0 top
C24 "1uF" Cap-0402 1775.18,107.03 r180 bottom
C25 "1uF" Cap-0402 1512.35,101.6 r90 top
C26 "1uF" Cap-0402 1658.18,45.67 r0 top
C27 "10uF" Cap-0603 1515.18,231.07 r270 bottom
C28 "22uF" Cap-0603 1409.64,373.86 r180 bottom
C29 "10uF" Cap-0603 1409.64,322.1 r180 bottom
C30 "10uF" Cap-0603 1460.18,231.07 r270 bottom
C31 "1uF" Cap-0402 1335.18,-2.57 r180 bottom
C32 "1uF" Cap-0402 1335.18,-62.77 r0 bottom
C33 "0.1uF" Cap-0402 1678.42,300.33 r90 bottom
C34 "22PF" Cap-0402 1345.18,54.53 r90 bottom value=22pF
C35 "22PF" Cap-0402 1345.18,130.03 r270 bottom value=22pF
C36 "0.1uF" Cap-0402 1500.18,361.99 r0 bottom
C37 "0.1uF" Cap-0402 1421.78,101.6 r90 top
C38 "10uF" Cap-0402 1467.68,-230.01 r270 top
C39 "2.2uF" Cap-0402 1377.68,-122.26 r90 top
C40 "1uF" Cap-0402 1335.18,-142.47 r180 bottom
C41 "2.2uF" Cap-0402 1425.18,-122.26 r270 top
C42 "1uF" Cap-0402 1367.68,23.98 r270 top
C43 "1uF" Cap-0402 1335.18,-102.47 r180 bottom
C44 "100nF" Cap-0402 1787.36,595.03 r270 top
C46 "22uF" Cap-0603 1562.36,707.53 r270 top
C47 "22uF" Cap-0603 1635.69,707.53 r270 top
C48 "22uF" Cap-0603 1709.02,707.53 r270 top
C51 "100nF" Cap-0402 1855.18,-184.42 r0 bottom
C52 "1uF" Cap-0402 955.52,481.02 r180 bottom
C53 "100nF" Cap-0402 883.03,235 r90 bottom
C54 "100nF" CAP-0201 1071.6,-128.1 r180 top
C55 "100nF" CAP-0201 674.51,-22.01 r0 top
C56 "100nF" Cap-0402 599.36,112.42 r0 top
C57 "100nF" Cap-0402 599.36,73.11 r0 top
C58 "100nF" Cap-0402 598.36,273.06 r0 bottom
C59 "100nF" Cap-0402 598.36,312.63 r0 bottom
C60 "100nF" Cap-0402 1852.68,95.03 r180 bottom
C61 "22uF" Cap-0603 1945.18,-102.86 r90 bottom
C62 "22uF" Cap-0603 1937.18,12.53 r270 bottom
C63 "10uF" Cap-0603 1894.18,-103.47 r270 bottom
C64 "10uF" Cap-0603 1886.18,13.53 r90 bottom
C65 "22uF" Cap-0603 1798.38,-45.47 r0 bottom
C66 "22uF" Cap-0402 946.71,165.39 r270 top
C67 "10uF" Cap-0402 1678.42,227.53 r270 bottom
C68 "10uF" Cap-0603 1624.36,-273.17 r90 bottom
C69 "22uF" Cap-0603 1604.54,383.89 r180 bottom
C70 "10uF" Cap-0603 1604.54,318.53 r180 bottom
C71 "22uF" Cap-0603 1624.36,-380.27 r90 bottom
C72 "100nF" Cap-0402 1623.29,480.66 r0 bottom
C73 "10uF" Cap-0603 1574.05,-379.66 r90 bottom
C77 "1uF" Cap-0402 1257.87,615.64 r180 bottom
C78 "0.1uF" Cap-0402 1257.87,657.23 r0 bottom
C79 "22uF" Cap-0805 508.03,-113.27 r0 bottom
C80 "100nF" Cap-0402 629.31,-122.93 r90 bottom
C81 "47uF" Cap-0805 635.31,-358.27 r90 bottom
C82 "100nF" Cap-0603 488.46,-358.23 r90 bottom
C83 "100nF" CAP-0201 2239.81,173.62 r135 bottom
C84 "4.7uF" Cap-0402 2168.81,250.12 r315 bottom
C85 "22uF" Cap-0603 553.98,-160.86 r270 top
C86 "100nF" Cap-0402 600.55,-162.84 r270 top
C87 "100nF" CAP-0201 2257.96,191.73 r135 bottom
C88 "100nF" CAP-0201 2195.19,416.2 r225 bottom
C89 "100nF" CAP-0201 2169.7,441.93 r225 bottom
C90 "100nF" CAP-0201 2119.66,214.95 r225 bottom
C91 "4.7uF" Cap-0402 2144.01,193.46 r45 bottom
C92 "4.7uF" Cap-0402 2196.91,290.88 r135 bottom
C93 "4.7uF" Cap-0402 2080.69,481.15 r315 bottom
C94 "22uF" Cap-0603 2068.86,256.03 r315 bottom
C95 "22uF" Cap-0603 1629.13,713.53 r270 bottom
C96 "4.7uF" Cap-0402 2228.36,324.03 r135 bottom
C97 "22uF" Cap-0603 1779.4,18.53 r90 top
C98 "22uF" Cap-0603 1779.18,-102.47 r270 top
C99 "22uF" Cap-0603 1687.36,713.53 r270 bottom
C100 "22uF" Cap-0603 1830.18,-102.47 r270 top
C101 "22uF" Cap-0603 1830.18,18.53 r90 top
C102 "22uF" Cap-0603 1604.54,435.53 r180 bottom
C103 "22uF" Cap-0603 1782.36,707.53 r270 top
C104 "10uF" Cap-0603 2132.68,311.03 r45 bottom
C105 "10uF" Cap-0603 2117.76,370.38 r45 bottom
C106 "10uF" Cap-0402 1568.18,493.86 r270 bottom
C107 "100nF" CAP-0201 2091.53,151.46 r225 bottom
C108 "100nF" CAP-0201 2344.36,376.03 r225 bottom
C109 "100nF" CAP-0201 2298.91,332.45 r315 bottom
C110 "100nF" CAP-0201 2297.36,262.53 r135 bottom
C111 "100nF" CAP-0201 2280.85,314.74 r315 bottom
C112 "100nF" CAP-0201 2274.37,240.65 r135 bottom
C113 "100nF" CAP-0201 2238.81,265.12 r45 bottom
C114 "4.7uF" Cap-0402 2358.35,342.64 r225 bottom
C115 "4.7uF" Cap-0402 2269.63,366.89 r45 bottom
C116 "10uF" Cap-0603 1524.05,-379.66 r90 bottom
C117 "4.7uF" Cap-0402 2429.86,602.53 r225 bottom
C118 "100nF" CAP-0201 1965.44,321.61 r225 bottom
C119 "1uF" Cap-0402 1925.36,401.53 r135 bottom
C120 "1uF" Cap-0402 1658.18,-7.27 r180 top
C121 "1uF" CAP-0201 1992.28,257.9 r45 bottom
C122 "1uF" Cap-0402 1916.93,121.74 r270 bottom
C123 "100nF" CAP-0201 2004.86,302.53 r135 bottom
C124 "100nF" CAP-0201 1877.36,427.53 r225 bottom
C125 "100nF" CAP-0201 1931.56,264.92 r315 bottom
C126 "100nF" CAP-0201 2255.07,443.16 r315 bottom
C127 "100nF" CAP-0201 2310.02,439.64 r225 bottom
C128 "100nF" CAP-0201 1785.18,224.08 r180 bottom
C129 "18pF" Cap-0402 1713.28,203.03 r270 top
C130 "18pF" Cap-0402 1713.28,114.03 r90 top
C131 "100nF" CAP-0201 1973.86,276 r45 bottom
C132 "1uF" Cap-0402 1702.36,595.03 r90 bottom
C133 "100nF" CAP-0201 2203.46,153.41 r45 bottom
C134 "4.7uF" Cap-0402 2428.2,-146.47 r180 top
C135 "100nF" CAP-0201 2041.49,226.75 r135 bottom
C136 "100nF" CAP-0201 2278.2,466.89 r315 bottom
C137 "100nF" CAP-0201 2299.59,488.89 r315 bottom
C138 "0.1uF" Cap-0402 2400.85,631.52 r225 bottom value=100nF
C139 "4.7uF" Cap-0402 2372.36,660.03 r225 bottom
C140 "100nF" CAP-0201 2530.4,-72.11 r90 bottom
C141 "100nF" Cap-0402 1918.18,36.53 r270 top
C142 "4.7uF" Cap-0402 1851.94,211.15 r270 bottom
C143 "100nF" CAP-0201 2323.94,509.21 r135 bottom
C144 "100nF" CAP-0201 2219.81,483 r315 bottom
C145 "100nF" CAP-0201 2077.48,189.96 r135 bottom
C146 "100nF" CAP-0201 674.51,-68.28 r0 top
C147 "100nF" CAP-0201 2130.64,447.42 r225 bottom
C148 "0.1uF" Cap-0402 1745.86,595.03 r270 bottom
C149 "1uF" CAP-0201 2080.1,386.4 r225 bottom
C150 "100nF" CAP-0201 2109.35,133.69 r45 bottom
C151 "100nF" CAP-0201 2165.53,500.04 r315 bottom
C152 "100nF" CAP-0201 1983.86,394.03 r315 bottom
C153 "100nF" CAP-0201 2055.69,150.49 r45 bottom
C154 "100nF" CAP-0201 2001.82,211.55 r45 bottom
C155 "100nF" CAP-0201 2172.64,131.4 r135 bottom
C156 "1nF" CAP-0201 2058.46,115.68 r225 bottom
C157 "1nF" CAP-0201 2530.35,26.06 r90 bottom
C158 "1nF" CAP-0201 2502.35,26.06 r90 bottom
C159 "1nF" CAP-0201 2502.35,-25.19 r270 bottom
C160 "100nF" CAP-0201 2040.16,392.63 r45 bottom
C161 "100nF" CAP-0201 2001.09,357.22 r45 bottom
C162 "100nF" CAP-0201 2047.25,342.82 r135 bottom
C163 "100nF" CAP-0201 2075.18,427.85 r45 bottom
C164 "0.1uF" Cap-0402 1704.38,-414.58 r270 bottom
C165 "1uF" Cap-0402 1774.18,-283.42 r90 bottom
C166 "0.1uF" Cap-0402 1814.88,-283.42 r270 bottom
C167 "4.7uF" Cap-0402 1408.83,504.24 r180 top
C168 "100nF" CAP-0201 2056.28,446.86 r225 bottom
C169 "1uF" CAP-0201 2020.14,429.8 r135 bottom
C170 "100nF" CAP-0201 1854.86,360.03 r45 bottom
C171 "100nF" CAP-0201 2024.86,322.53 r135 bottom
C172 "100nF" CAP-0201 2001.97,411.9 r315 bottom
C173 "1uF" Cap-0402 1787.36,595.03 r270 bottom
C174 "1uF" CAP-0201 2036.86,466.03 r225 bottom
C175 "100nF" Cap-0402 2537.4,-249.14 r90 top
C176 "100nF" Cap-0402 2537.4,-403.51 r270 top
C178 "0.1uF" Cap-0402 2717.17,384.91 r180 bottom
C179 "0.1uF" Cap-0402 3138.31,561.13 r180 bottom
C180 "100nF" CAP-0201 2178.81,175.12 r45 bottom
C181 "100nF" CAP-0201 2017.36,172.96 r315 bottom
C182 "DNP" Cap-0201 708.29,653.35 r90 top
C183 "DNP" Cap-0201 708.29,428.94 r270 top
C184 "DNP" Cap-0201 628.29,653.35 r90 top
C185 "DNP" Cap-0201 627.29,428.92 r270 top
C186 "22uF" Cap-0603 1490.18,462.53 r0 bottom
C188 "0.1uF" Cap-0402 2162.71,-242.95 r90 top
C189 "100nF" Cap-0402 2579.65,-249.14 r90 top
C190 "0.1uF" Cap-0402 2263.6,-186.28 r180 top
C191 "4.7uF" Cap-0402 2333.85,-105.83 r180 top
C192 "0.1uF" Cap-0402 2202.6,-242.95 r90 top
C193 "0.1uF" Cap-0402 2338.85,-187.01 r180 top
C194 "0.1uF" Cap-0402 2263.5,-105.83 r180 top
C195 "0.1uF" Cap-0402 2263.6,-146.49 r180 top
C196 "10uF" Cap-0603 3034.35,-376.58 r0 bottom
C197 "22uF" Cap-0603 2997.36,30.03 r180 bottom
C198 "22uF" Cap-0603 3219.17,-59.53 r90 bottom
C199 "10uF" Cap-0603 2837.36,710.03 r270 bottom
C200 "10uF" Cap-0603 3167.36,-59.53 r90 bottom
C201 "10uF" Cap-0603 3158.87,445.19 r180 bottom
C202 "10uF" Cap-0402 2709.86,102.53 r180 bottom
C203 "0.1uF" Cap-0402 2942.59,-136.12 r270 bottom
C204 "1uF" Cap-0402 2787.36,384.91 r0 bottom
C205 "1uF" Cap-0402 2882.36,615.03 r90 bottom
C206 "0.1uF" Cap-0402 2787.36,297.53 r180 bottom
C207 "0.1uF" Cap-0402 2772.36,154.23 r90 bottom
C208 "0.1uF" Cap-0402 2857.36,244.03 r0 bottom
C209 "0.1uF" Cap-0402 2858.34,142.01 r0 bottom
C210 "0.1uF" Cap-0402 2947.36,190.03 r180 bottom
C211 "0.1uF" Cap-0402 2875.86,87.53 r90 bottom
C212 "0.1uF" Cap-0402 2697.36,267.49 r270 bottom
C213 "0.1uF" Cap-0402 2947.36,90.03 r180 bottom
C214 "0.1uF" Cap-0402 3146.36,309.53 r180 bottom
C215 "0.1uF" Cap-0402 3022.36,90.03 r0 bottom
C216 "100nF" CAP-0201 2635.75,729.91 r270 bottom
C217 "0.1uF" Cap-0402 3022.36,293.63 r0 bottom
C218 "0.1uF" Cap-0402 2947.36,142.17 r180 bottom
C220 "0.1uF" Cap-0402 2977.36,709.36 r270 bottom
C221 "0.1uF" Cap-0402 3071.77,142.17 r0 bottom
C223 "0.1uF" Cap-0402 3022.36,187.49 r0 bottom
C225 "0.1uF" Cap-0402 2862.36,545.03 r0 bottom
C227 "0.1uF" Cap-0402 2842.36,615.03 r270 bottom
C228 "0.1uF" Cap-0402 2835.86,87.53 r270 bottom
C229 "0.1uF" Cap-0402 2772.36,522.53 r270 bottom
C230 "10uF" Cap-0603 3163.66,218.28 r180 bottom
C231 "10uF" Cap-0603 3158.87,507.57 r180 bottom
C232 "0.1uF" Cap-0402 2857.36,190.03 r0 bottom
C233 "0.1uF" Cap-0402 2772.36,607.83 r270 bottom
C234 "0.1uF" Cap-0402 3022.36,470.03 r180 bottom
C235 "0.1uF" Cap-0402 2709.86,152.83 r180 bottom
C236 "0.1uF" Cap-0402 2947.36,245.03 r180 bottom
C237 "0.1uF" Cap-0402 2772.36,80.03 r90 bottom
C238 "DNP" Cap-0402 3142.36,367.53 r180 bottom
C239 "100nF" CAP-0201 3020.68,223.79 r180 bottom
C240 "0.1uF" Cap-0402 2697.36,472.49 r90 bottom
C241 "0.1uF" Cap-0402 3022.36,395.03 r0 bottom
C242 "0.1uF" Cap-0402 2947.36,599.03 r180 bottom
C243 "0.1uF" Cap-0402 2802.36,229.33 r270 bottom
C244 "0.1uF" Cap-0402 2787.36,462.03 r0 bottom
C245 "0.1uF" Cap-0402 2947.36,500.03 r180 bottom
C246 "0.1uF" Cap-0402 2862.36,445.03 r0 bottom
C247 "0.1uF" Cap-0402 2947.36,445.29 r180 bottom
C248 "0.1uF" Cap-0402 2862.36,500.03 r0 bottom
C249 "0.1uF" Cap-0402 3027.36,527.48 r270 bottom
C250 "0.1uF" Cap-0402 2947.36,551.53 r180 bottom
C251 "0.1uF" Cap-0402 2052.31,-155.84 r270 top
C252 "2.2uF" Cap-0402 2122.35,-242.95 r270 top
C253 "4.7uF" Cap-0402 2427.85,-106.51 r180 top
C254 "100pF" Cap-0402 3126.19,-244.57 r90 bottom
C255 "22uF" Cap-0603 3163.66,123.3 r180 bottom
C256 "10uF" Cap-0402 2697.36,552.53 r270 bottom
C257 "0.1uF" Cap-0402 968.02,620.52 r90 bottom
C258 "100nF" CAP-0201 857.75,-369.23 r90 top
C262 "4.7uF" Cap-0402 2228.26,396.95 r225 bottom
C273 "12pF" Cap-0402 904.74,165.39 r90 top
C275 "12pF" Cap-0402 751.07,165.39 r270 top locked
C287 "22uF" Cap-0603 1089.6,-187.79 r90 bottom
C290 "10uF" Cap-0603 1306.36,-362.29 r90 bottom
C292 "DNP" Cap-0402 1126.89,-281.27 r90 bottom value=6.8pF
C293 "100nF" Cap-0402 1090.6,-97.96 r270 bottom
C300 "0.1uF" Cap-0402 3027.36,615.03 r270 bottom
C310 "100nF" CAP-0201 888.3,-369.23 r90 top
C312 "100nF" CAP-0201 672.51,-207.01 r0 top
C313 "100nF" CAP-0201 1071.6,-222.89 r180 top
C314 "100nF" CAP-0201 1071.6,-175.65 r180 top
C315 "100nF" CAP-0201 952.3,28.95 r270 top
C316 "100nF" CAP-0201 794.83,38.95 r270 top
C317 "100nF" CAP-0201 672.51,-134.72 r0 top
C318 "100nF" CAP-0201 936.55,79.97 r270 top
C319 "100nF" CAP-0201 1071.6,-270.14 r180 top
C320 "100nF" CAP-0201 909.8,28.95 r90 top
C321 "100nF" CAP-0201 883.81,28.95 r90 top
C322 "15pF" Cap-0402 1097.67,48.39 r180 top
C323 "15pF" Cap-0402 995.17,121.97 r270 top
C324 "4.7uF" Cap-0402 737.03,-411.29 r90 top
C325 "100nF" CAP-0201 680.51,-254.39 r0 top
C326 "100nF" CAP-0201 1071.6,-81.22 r180 top
D1 "ESD5451N" "DFN1006-2L (Bi-Directional)" 3216.87,266.54 r180 bottom
D2 "ESD5451N" "DFN1006-2L (Bi-Directional)" 3216.87,170.79 r180 bottom
D3 "ESD5451N" "DFN1006-2L (Bi-Directional)" 3208.87,560.58 r0 bottom
D4 "ESD5451N" "DFN1006-2L (Bi-Directional)" 2337.19,-269.57 r180 top
D5 "ESD5451N" "DFN1006-2L (Bi-Directional)" 2405.6,-269.57 r0 top
D6 "ESD9X5VU" DFN1006-2L_ 1890.53,-378.9 r270 bottom
D7 "ESD9X5VU" DFN1006-2L_ 1933.15,-378.9 r270 bottom
D8 "ESD5451N" "DFN1006-2L (Bi-Directional)" 1858.5,-283.25 r90 bottom
D9 "ESD5304D-10/TR" DFN2510-10L_ 2762.41,-139.5 r90 top
D10 "ESD5304D-10/TR" DFN2510-10L_ 2953.37,-284.71 r90 top
D11 "ESD5451N" "DFN1006-2L (Bi-Directional)" 2672.15,729.91 r270 bottom
D29 "ESD5341N-2/TR" DFN1006-2L_ 682.69,207.53 r0 bottom
D30 "ESD5341N-2/TR" DFN1006-2L_ 682.68,155.53 r0 bottom
D31 "ESD5451N" "DFN1006-2L (Bi-Directional)" 609.55,-90.91 r270 top
F1 "0458005.DR" "Fuse 1206 (3216 Metric)" 481.36,-126.56 r270 top
FB7 "BLM18SG700TN1D" "IND-0603 (1608 Metric)" 1220.44,-55.58 r180 top
FB8 "BLM18SG700TN1D" "IND-0603 (1608 Metric)" 923.08,-401.42 r90 top
FB11 "BLM18SG700TN1D" "IND-0603 (1608 Metric)" 822.56,-401.42 r90 top
FB12 "BLM18SG700TN1D" "IND-0603 (1608 Metric)" 1105.06,-305.12 r180 top
FB13 "BLM18SG700TN1D" "IND-0603 (1608 Metric)" 662.81,29.74 r0 top
J2 "10118192-0001LF" 10118192-0001LF_ 1924.17,-353.27 r180 top locked
J3 "U.FL-R-SMT-1(80)" U.FL-R-SMT-1(80)_ 532.53,674.85 r90 top locked
J4 "U.FL-R-SMT-1(80)" U.FL-R-SMT-1(80)_ 532.53,476.5 r90 top locked
J7 "HDMI-101W" HDMI-101W 2778.15,-309.38 r0 top locked
J9 "GT-USB-8013A" GT-USB-8013A 490.52,171.45 r270 top locked
L1 "2.2uH" "Inductor 1008" 1245.36,322.24 r90 bottom
L2 "240nH" WPN252012HR24MT_ 1512.36,718.83 r0 bottom
L3 "470nH" IND-0806 1809.18,-117.41 r180 bottom
L4 "470nH" IND-0806 1802.18,26.47 r180 bottom
L5 "470nH" IND-0806 1379.38,228.4 r90 bottom
L6 "470nH" IND-0806 1609.06,225.53 r270 bottom
L7 "470nH" IND-0806 1543.18,-266.47 r90 bottom
L8 "SDMM0806H-2-900T" 0302 1911.35,-295.96 r90 bottom
L9 "2.2uH" "Inductor 1008" 1419.83,426.19 r270 top
L10 "2.2uH" WPN4020H2R2MT_ 3051.36,-91.56 r90 bottom
L11 "2.2uH" SWPA3015S2R2MT 1203.89,-107.79 r180 bottom
L12 "3.3uH" 0630CDMCCDS-3R3MC 872.31,-314.28 r180 bottom locked
L13 "SDMM0806H-2-900T" 0302 776.4,181.68 r0 bottom
LED1 "XL-3528SURUBC" XL-3528SURUBC 1942.66,737.53 r180 top locked
Q7 "MMBT2222ATT3G" MMBT2222ATT3G 1909.76,705.5 r270 bottom
Q8 "MMBT2222ATT3G" MMBT2222ATT3G 2026.84,705.5 r270 bottom
R1 "10K" Res-0402 807.76,711.31 r270 bottom
R2 "DNP" Res-0402 1163.11,541.73 r270 bottom
R3 "0R" Res-0402 1371.18,210.73 r90 top
R4 "20K" Res-0402 1108.6,-7.97 r0 bottom
R5 "100K" Res-0402 1500.18,405.03 r180 bottom
R6 "2.2K" Res-0402 1772.68,267.26 r180 bottom
R7 "2.2K" Res-0402 1772.68,309.58 r180 bottom
R8 "33K" Res-0402 1500.18,317.21 r0 bottom
R9 "10K" Res-0201 1174.99,701.77 r270 bottom
R10 "22R" Res-0201 1204.61,701.77 r270 bottom
R11 "200K" Res-0402 680.31,6.72 r0 bottom value=200kR
R12 "51K" Res-0402 1662.36,595.03 r270 top value=51kR
R13 "22R" Res-0402 1617.36,595.03 r90 bottom
R14 "100R" Res-0201 1856.23,284.35 r135 bottom
R15 "100R" Res-0201 1875.4,303.75 r135 bottom
R16 "15K" Res-0402 1877.36,-33.95 r90 top
R17 "10K" Res-0402 1877.36,36.53 r90 top
R18 "100R" Res-0402 1855.18,-225.97 r0 bottom
R19 "100R" Res-0402 1852.68,135.03 r0 bottom
R20 "560R" Res-0402 1784.39,-184.42 r180 bottom
R21 "100R" Res-0402 1744.86,595.03 r270 top
R22 "10K" Res-0201 1652.81,345.12 r315 top
R23 "9.1K" Res-0402 1784.39,-225.97 r180 bottom value=9.1kR
R24 "120K" Res-0402 1417.97,-230.01 r270 top
R25 "47K" Res-0402 1468,-300.87 r270 top
R26 "100R" Res-0402 1623.29,520.53 r180 bottom
R27 "20K" Res-0402 810.19,481.02 r180 bottom
R28 "DNP" Res-0402 2011.19,-155.84 r90 top
R29 "0R" Res-0402 2314.86,717.53 r45 bottom
R30 "0R" Res-0201 1965.36,214.03 r45 bottom
R31 "100R" Res-0402 3148.36,170.79 r0 bottom
R32 "31.6K" Res-0402 1084.6,51.81 r270 bottom
R33 "10K" Res-0402 1042.6,51.81 r90 bottom value=10kR
R34 "10K" Res-0402 1831.36,731.73 r270 bottom
R35 "DNP" Res-0201 1171.08,-93.37 r0 top
R36 "DNP" Res-0201 1171.08,-116.59 r0 top
R37 "22R" Res-0402 3146.36,266.54 r0 bottom
R38 "NC" Res-0402 680.31,-43.28 r180 bottom
R39 "100R" Res-0402 2602.17,736.18 r270 bottom
R40 "120R" Res-0402 2458.36,574.11 r225 bottom
R41 "10K" Res-0402 1948.16,731.73 r90 bottom
R42 "100K" Res-0402 1890.13,746.73 r180 bottom
R43 "1M" Res-0402 1768.28,138.53 r0 top value=1MR
R44 "100R" Res-0402 3138.31,602.53 r0 bottom
R45 "0R" Res-0402 1775.18,190.07 r0 bottom
R46 "22R" Res-0402 1768.28,178.03 r180 top
R47 "200R" Res-0402 1948.16,648.21 r270 bottom
R48 "DNP" Res-0201 1171.08,-187.86 r0 top
R49 "DNP" Res-0201 1171.08,-211.08 r0 top
R50 "0R" Res-0402 1339.62,741.18 r180 bottom
R51 "DNP" Res-0402 1239.21,210.73 r90 top
R52 "DNP" Res-0201 1171.08,-258.2 r0 top
R53 "22R" Res-0402 2499.35,-106.51 r180 top
R54 "DNP" Res-0201 1171.08,-234.98 r0 top
R55 "DNP" Res-0201 1171.08,-163.84 r0 top
R56 "0R" Res-0402 2499.35,-146.47 r180 top
R57 "33R" Res-0402 998.95,301.25 r270 bottom
R58 "2.2R" Res-0201 1672.35,364.75 r135 top
R59 "2.2R" Res-0201 1694.85,387.53 r135 top
R60 "10K" Res-0201 2128.38,115.12 r45 bottom
R61 "10K" Res-0201 2558.6,24.06 r270 bottom
R62 "10K" Res-0201 2558.6,-23.19 r90 bottom
R63 "10K" Res-0201 2530.35,-23.19 r90 bottom
R64 "2.2R" Res-0201 1717.35,410.03 r135 top
R65 "2.2R" Res-0201 1739.85,432.53 r135 top
R66 "2.2R" Res-0201 1762.35,455.03 r135 top
R67 "2.2R" Res-0201 1784.85,477.53 r135 top
R68 "22R" Res-0402 1042.88,209.88 r0 top
R69 "33R" Res-0402 1055.81,301.26 r270 bottom
R70 "33R" Res-0402 1096.25,301.25 r270 bottom
R71 "2.2R" Res-0201 1807.35,500.03 r135 top
R72 "2.2R" Res-0201 1829.85,522.53 r135 top
R73 "1.62K" Res-0201 1920.57,348.86 r315 bottom value=1.62kR
R74 "DNP" Res-0201 1171.08,-140.62 r0 top
R76 "4.7K" Res-0402 2580.07,-320.84 r270 top
R77 "4.7K" Res-0402 2580.07,-403.27 r270 top
R80 "33R" Res-0402 1136.68,301.26 r270 bottom
R81 "33R" Res-0402 1177.11,301.26 r270 bottom
R82 "10K" Res-0201 2566.2,729.91 r90 bottom
R85 "200R" Res-0402 2071.08,731.73 r270 bottom
R86 "100K" Res-0402 2006.66,746.73 r180 bottom
R87 "0R" Res-0402 2427.85,-187.01 r180 top
R89 "10K" Res-0402 956.65,373.23 r270 bottom
R93 "0R" Res-0402 2343.36,689.03 r45 bottom
R94 "100K" Res-0402 968.4,692.81 r270 bottom
R95 "DNP" Res-0402 1203.98,541.73 r270 bottom
R96 "22R" Res-0402 1122.24,541.73 r90 bottom
R98 "DNP" Res-0603 3163.82,31.03 r180 bottom
R99 "20K" Res-0402 2899.07,-136.13 r90 bottom
R100 "2K" Res-0402 3167.35,-244.57 r90 bottom value=2kR
R101 "100K" Res-0402 3126.19,-316.75 r90 bottom
R102 "240R" Res-0402 2932.36,709.36 r90 bottom
R103 "240R" Res-0402 2887.36,709.36 r90 bottom
R104 "0R" Res-0603 2775.86,711.03 r270 bottom
R105 "10K" Res-0402 2263.29,-268.42 r180 top
R106 "10K" Res-0402 2263.29,-227.4 r180 top
R107 "10K" Res-0402 2202.6,-165.81 r90 top
R108 "47K" Res-0402 2150.71,-166.13 r90 top
R109 "10K" Res-0402 1772.68,358.97 r180 bottom
R110 "10K" Res-0402 759.15,426.97 r270 bottom
R111 "DNP" Res-0201 1052.04,-353.19 r90 top
R112 "DNP" Res-0201 1109.06,-401.29 r270 top
R113 "150K" Res-0402 1126.89,-371.79 r270 bottom
R114 "0R" Res-0402 671.59,151.69 r180 top
R115 "0R" Res-0402 671.59,191.53 r180 top
R116 "0R" Res-0402 598.36,132.73 r180 bottom
R117 "0R" Res-0402 598.36,233.03 r180 bottom
R118 "150K" Res-0402 1084.6,-281.27 r90 bottom
R119 "DNP" Res-0201 994.83,-401.29 r270 top
R120 "10K" Res-0201 1023.83,-401.29 r270 top
R121 "10K" Res-0201 1080.45,-401.29 r270 top
R122 "DNP" Res-0201 1052.04,-401.29 r270 top
R123 "20K" Res-0402 715.29,426.86 r270 bottom
R124 "DNP" Res-0201 1071.6,5.47 r0 top
R125 "DNP" Res-0201 1071.88,-47.44 r0 top
R126 "0R" Res-0402 664.51,-101.6 r0 top
R128 "DNP" Res-0201 1123.89,-258.2 r180 top
R129 "6.04K" Res-0402 762.26,33.95 r90 top
R130 "DNP" Res-0201 1123.89,-234.98 r180 top
R131 "1M" Res-0402 1016.43,48.39 r180 top value=1MR
R132 "100K" Res-0402 778.4,-411.29 r90 top
R133 "DNP" Res-0201 1123.89,-211.08 r180 top
R134 "DNP" Res-0201 1123.89,-187.86 r180 top
R135 "30K" Res-0402 998.94,373.23 r270 bottom
R136 "30K" Res-0402 1055.81,373.23 r270 bottom
R137 "30K" Res-0402 1096.24,373.23 r270 bottom
R138 "30K" Res-0402 1136.67,373.23 r270 bottom
R139 "30K" Res-0402 1177.11,373.23 r270 bottom
R140 "0R" Res-0402 1339.62,615.64 r180 bottom
R141 "DNP" Res-0201 1123.89,-163.84 r180 top
R142 "DNP" Res-0201 1123.89,-140.62 r180 top
R143 "DNP" Res-0201 1123.89,-116.59 r180 top
R144 "DNP" Res-0201 1123.89,-93.37 r180 top
R145 "DNP" Res-0201 1123.89,5.47 r180 top
R146 "DNP" Res-0201 1123.89,-45.44 r180 top
R147 "DNP" Res-0201 1123.89,-69.34 r180 top
R148 "DNP" Res-0201 965.82,-401.29 r90 top
R152 "100K" Res-0402 664.61,-312.85 r0 top
R153 "DNP" Res-0402 664.61,-353.42 r180 top
R159 "22R" Res-0402 832.85,226.73 r0 top locked
R169 "0R" Res-0402 671.86,112.39 r180 top
R170 "0R" Res-0402 671.85,73.08 r180 top
R171 "0R" Res-0402 670.86,69.15 r180 bottom
R172 "0R" Res-0402 670.86,108.45 r180 bottom
R173 "0R" Res-0402 671.18,273.06 r180 bottom
R174 "0R" Res-0402 671.18,312.6 r180 bottom
R175 "0R" Res-0402 671.59,230.3 r180 top
R176 "0R" Res-0402 671.59,269.6 r180 top
SW1 "B3U-1000P" B3U-1000P 3186.17,284.53 r270 top
SW2 "B3U-1000P" B3U-1000P 3186.17,89.72 r90 top
SW3 "B3U-1000P" B3U-1000P 3186.17,478.46 r270 top
SW4 "EVQ-PUA02K" EVQPUA02K 2565.36,723.73 r0 top locked
TP1 "TEST POINT 0.5mm Dia" "Test-point - 0.5mm" 488.46,-416.63 r0 top
TP2 "TEST POINT 0.5mm Dia" "Test-point - 0.5mm" 621.77,-416.82 r0 top
TP3 "TEST POINT 0.5mm Dia" "Test-point - 0.5mm" 2354.83,-416.77 r90 top
TP5 "TEST POINT 0.5mm Dia" "Test-point - 0.5mm" 2428.59,-416.77 r90 top
TP6 "TEST POINT 0.5mm Dia" "Test-point - 0.5mm" 2280.59,-416.79 r90 top
TP7 "TEST POINT 0.5mm Dia" "Test-point - 0.5mm" 555.11,-416.63 r0 top
TP13 "TEST POINT 0.5mm Dia" "Test-point - 0.5mm" 1238.06,-416.94 r90 top
TP16 "TEST POINT 0.5mm Dia" "Test-point - 0.5mm" 1377.06,-416.94 r90 top
TP17 "TEST POINT 0.5mm Dia" "Test-point - 0.5mm" 1309.05,-416.94 r90 top
TP18 "TEST POINT 0.5mm Dia" "Test-point - 0.5mm" 1170.06,-416.94 r90 top
U1 "RK3566" BGA-565(15.5x14.4) 2142.04,325.82 r225 top locked
U2 "TPD12S016RKTR" "24-UQFN (4x2)" 2562.36,-356.27 r0 bottom locked
U3 "KLMAG1JETD-B041" FBGA-153(11.5x13) 2244.85,-174.97 r0 bottom locked
U4 "SY6280AAC" SOT-23-5 845.63,591.55 r90 bottom
U5 "SYR838PKC" CSP1.56*1.96-20 1535.86,597.19 r90 bottom
U6 "SCT2450STER" ESOP-8 873.35,-68.28 r0 bottom locked
U7 "RK809-5" 68-QFN-(7x7) 1551.27,-9.97 r180 bottom locked
U8 "AP2331SA-7" SOT-23 1797.65,-386.6 r0 bottom
U11 "SY8089AAAC" SOT-23-5 3034.35,-269.57 r270 bottom
U12 "K4U6E3S4AA-MGCL" "200-WFBGA (10x15)" 2905.58,343.83 r0 top locked
U16 "TLV62569DBVR" SOT-23-5 1213.89,-280.59 r270 bottom locked
U17 "AP6275S" AP6275S_ 1045.1,523.43 r0 top locked
U18 "LT6711" "QFN 64 (7.5x7.5)" 881.43,-167.78 r180 top
U19 "SY6280AAC" SOT-23-5 845.63,362.81 r90 bottom
X1 "32.768kHz" SMD3215-2P 1275.18,94.03 r90 bottom
X2 "24MHZ" X322524MOB4SI- 1611.78,157.53 r270 top
X3 "37.4MHz" Q22FA12800078_ 825.85,159.52 r180 top locked
X5 "32.768kHz" SMD3225-4P 1078.37,645.23 r0 bottom
X6 "27MHz" SMD2520-4P 1079.68,124.8 r180 top

## Footprints (in the part's own frame and the unit in brackets; to place one, negate y for a bottom-side part, rotate by r counter-clockwise, add the part's x,y. Pads: shape width x height; smd on the part's side, far side on the other; paste and mask are expansions set on the pad)
"24-UQFN (4x2)" [mm]
  rect 0.75x0.2 smd paste+0 mask+0.038: 1(-0.825,1.8) 2(-0.825,1.4) 3(-0.825,1) 4(-0.825,0.6) 5(-0.825,0.2) 6(-0.825,-0.2) 7(-0.825,-0.6) 8(-0.825,-1) 9(-0.825,-1.4) 10(-0.825,-1.8) 13(0.825,-1.8) 14(0.825,-1.4) 15(0.825,-1) 16(0.825,-0.6) 17(0.825,-0.2) 18(0.825,0.2) 19(0.825,0.6) 20(0.825,1) 21(0.825,1.4) 22(0.825,1.8)
  rect 0.2x0.75 smd paste+0 mask+0.038: 11(-0.2,-1.825) 12(0.2,-1.825) 23(0.2,1.825) 24(-0.2,1.825)
  silkscreen extent -1.75,-2.05 1,2.08, body extent -1,-2 1,2, height 0.55
68-QFN-(7x7) [mm]
  rect 0.8x0.22 smd: 1(-3.435,2.8) 2(-3.435,2.45) 3(-3.435,2.1) 4(-3.435,1.75) 5(-3.435,1.4) 6(-3.435,1.05) 7(-3.435,0.7) 8(-3.435,0.35) 9(-3.435,0) 10(-3.435,-0.35) 11(-3.435,-0.7) 12(-3.435,-1.05) 13(-3.435,-1.4) 14(-3.435,-1.75) 15(-3.435,-2.1) 16(-3.435,-2.45) 17(-3.435,-2.8) 35(3.435,-2.8) 36(3.435,-2.45) 37(3.435,-2.1) 38(3.435,-1.75) 39(3.435,-1.4) 40(3.435,-1.05) 41(3.435,-0.7) 42(3.435,-0.35) 43(3.435,0) 44(3.435,0.35) 45(3.435,0.7) 46(3.435,1.05) 47(3.435,1.4) 48(3.435,1.75) 49(3.435,2.1) 50(3.435,2.45) 51(3.435,2.8)
  rect 0.22x0.8 smd: 18(-2.8,-3.435) 19(-2.45,-3.435) 20(-2.1,-3.435) 21(-1.75,-3.435) 22(-1.4,-3.435) 23(-1.05,-3.435) 24(-0.7,-3.435) 25(-0.35,-3.435) 26(0,-3.435) 27(0.35,-3.435) 28(0.7,-3.435) 29(1.05,-3.435) 30(1.4,-3.435) 31(1.75,-3.435) 32(2.1,-3.435) 33(2.45,-3.435) 34(2.8,-3.435) 52(2.8,3.435) 53(2.45,3.435) 54(2.1,3.435) 55(1.75,3.435) 56(1.4,3.435) 57(1.05,3.435) 58(0.7,3.435) 59(0.35,3.435) 60(0,3.435) 61(-0.35,3.435) 62(-0.7,3.435) 63(-1.05,3.435) 64(-1.4,3.435) 65(-1.75,3.435) 66(-2.1,3.435) 67(-2.45,3.435) 68(-2.8,3.435)
  rect 5.63x5.63 smd paste-4: 69(0,0)
  silkscreen extent -4.11,-3.5 3.5,3.5, body extent -3.51,-3.51 3.51,3.51, height 0.8
"200-WFBGA (10x15)" [mm]
  round 0.32 smd paste+0 mask+0.05: A1(-4.4,6.825) A2(-3.6,6.825) A3(-2.8,6.825) A4(-2,6.825) A5(-1.2,6.825) A8(1.2,6.825) A9(2,6.825) A10(2.8,6.825) A11(3.6,6.825) A12(4.4,6.825) AA1(-4.4,-6.175) AA2(-3.6,-6.175) AA3(-2.8,-6.175) AA4(-2,-6.175) AA5(-1.2,-6.175) AA8(1.2,-6.175) AA9(2,-6.175) AA10(2.8,-6.175) AA11(3.6,-6.175) AA12(4.4,-6.175) AB1(-4.4,-6.825) AB2(-3.6,-6.825) AB3(-2.8,-6.825) AB4(-2,-6.825) AB5(-1.2,-6.825) AB8(1.2,-6.825) AB9(2,-6.825) AB10(2.8,-6.825) AB11(3.6,-6.825) AB12(4.4,-6.825) B1(-4.4,6.175) B2(-3.6,6.175) B3(-2.8,6.175) B4(-2,6.175) B5(-1.2,6.175) B8(1.2,6.175) B9(2,6.175) B10(2.8,6.175) B11(3.6,6.175) B12(4.4,6.175) C1(-4.4,5.525) C2(-3.6,5.525) C3(-2.8,5.525) C4(-2,5.525) C5(-1.2,5.525) C8(1.2,5.525) C9(2,5.525) C10(2.8,5.525) C11(3.6,5.525) C12(4.4,5.525) D1(-4.4,4.875) D2(-3.6,4.875) D3(-2.8,4.875) D4(-2,4.875) D5(-1.2,4.875) D8(1.2,4.875) D9(2,4.875) D10(2.8,4.875) D11(3.6,4.875) D12(4.4,4.875) E1(-4.4,4.225) E2(-3.6,4.225) E3(-2.8,4.225) E4(-2,4.225) E5(-1.2,4.225) E8(1.2,4.225) E9(2,4.225) E10(2.8,4.225) E11(3.6,4.225) E12(4.4,4.225) F1(-4.4,3.575) F2(-3.6,3.575) F3(-2.8,3.575) F4(-2,3.575) F5(-1.2,3.575) F8(1.2,3.575) F9(2,3.575) F10(2.8,3.575) F11(3.6,3.575) F12(4.4,3.575) G1(-4.4,2.925) G2(-3.6,2.925) G3(-2.8,2.925) G4(-2,2.925) G5(-1.2,2.925) G8(1.2,2.925) G9(2,2.925) G10(2.8,2.925) G11(3.6,2.925) G12(4.4,2.925) H1(-4.4,2.275) H2(-3.6,2.275) H3(-2.8,2.275) H4(-2,2.275) H5(-1.2,2.275) H8(1.2,2.275) H9(2,2.275) H10(2.8,2.275) H11(3.6,2.275) H12(4.4,2.275) J1(-4.4,1.625) J2(-3.6,1.625) J3(-2.8,1.625) J4(-2,1.625) J5(-1.2,1.625) J8(1.2,1.625) J9(2,1.625) J10(2.8,1.625) J11(3.6,1.625) J12(4.4,1.625) K1(-4.4,0.975) K2(-3.6,0.975) K3(-2.8,0.975) K4(-2,0.975) K5(-1.2,0.975) K8(1.2,0.975) K9(2,0.975) K10(2.8,0.975) K11(3.6,0.975) K12(4.4,0.975) N1(-4.4,-0.975) N2(-3.6,-0.975) N3(-2.8,-0.975) N4(-2,-0.975) N5(-1.2,-0.975) N8(1.2,-0.975) N9(2,-0.975) N10(2.8,-0.975) N11(3.6,-0.975) N12(4.4,-0.975) P1(-4.4,-1.625) P2(-3.6,-1.625) P3(-2.8,-1.625) P4(-2,-1.625) P5(-1.2,-1.625) P8(1.2,-1.625) P9(2,-1.625) P10(2.8,-1.625) P11(3.6,-1.625) P12(4.4,-1.625) R1(-4.4,-2.275) R2(-3.6,-2.275) R3(-2.8,-2.275) R4(-2,-2.275) R5(-1.2,-2.275) R8(1.2,-2.275) R9(2,-2.275) R10(2.8,-2.275) R11(3.6,-2.275) R12(4.4,-2.275) T1(-4.4,-2.925) T2(-3.6,-2.925) T3(-2.8,-2.925) T4(-2,-2.925) T5(-1.2,-2.925) T8(1.2,-2.925) T9(2,-2.925) T10(2.8,-2.925) T11(3.6,-2.925) T12(4.4,-2.925) U1(-4.4,-3.575) U2(-3.6,-3.575) U3(-2.8,-3.575) U4(-2,-3.575) U5(-1.2,-3.575) U8(1.2,-3.575) U9(2,-3.575) U10(2.8,-3.575) U11(3.6,-3.575) U12(4.4,-3.575) V1(-4.4,-4.225) V2(-3.6,-4.225) V3(-2.8,-4.225) V4(-2,-4.225) V5(-1.2,-4.225) V8(1.2,-4.225) V9(2,-4.225) V10(2.8,-4.225) V11(3.6,-4.225) V12(4.4,-4.225) W1(-4.4,-4.875) W2(-3.6,-4.875) W3(-2.8,-4.875) W4(-2,-4.875) W5(-1.2,-4.875) W8(1.2,-4.875) W9(2,-4.875) W10(2.8,-4.875) W11(3.6,-4.875) W12(4.4,-4.875) Y1(-4.4,-5.525) Y2(-3.6,-5.525) Y3(-2.8,-5.525) Y4(-2,-5.525) Y5(-1.2,-5.525) Y8(1.2,-5.525) Y9(2,-5.525) Y10(2.8,-5.525) Y11(3.6,-5.525) Y12(4.4,-5.525)
  silkscreen extent -5.7,-7.58 5.08,7.6, body extent -5,-7.5 5,7.5, height 0.91
0302 [mm]
  rect 0.3x0.3 smd paste+0 mask+0.051: 1(0.25,0.3) 2(0.25,-0.3) 3(-0.25,0.3) 4(-0.25,-0.3)
  silkscreen extent -0.53,-0.58 0.8,0.58, body extent -0.42,-0.34 0.44,0.33, height 0.42
0630CDMCCDS-3R3MC [mm]
  rect 2.4x3.2 smd paste+0 mask+0.051: 1(-3,0) 2(3,0)
  silkscreen extent -3.5,-3.3 3.5,3.3, body extent -3.5,-3.3 3.5,3.3, height 3.1
10118192-0001LF_ [mm] "CONN RCPT USB2.0 MICRO B SMD R/A"
  rect 0.4x1.35 smd: 1(1.3,-1.337) 2(0.65,-1.337) 3(0,-1.337) 4(-0.65,-1.337) 5(-1.3,-1.337)
  rect 2.1x1.6 smd: S1(3.1,-1.212) S2(-3.1,-1.212)
  rect 1.8x1.9 smd: S3(-3.8,1.338) S6(3.8,1.338)
  rect 1.9x1.9 smd: S4(-1.2,1.338) S5(1.2,1.338)
  silkscreen extent -3.75,-1.56 3.75,0.16, body extent -3.95,-1.57 3.96,4.09, height 2.74